# Altium PCB POD-Design-v1.0.PcbDoc (part 1 of 8)
Units mil, origin at the board's own origin, x right, y up, seen from the top; angles counter-clockwise.
Board outline 5511.81 x 3937.01 mil, 4 copper layers (Top Layer, Layer 1, Layer 2, Bottom Layer), stack 61.653 mil thick; 347 components, 252 nets, 1015 pads, 412 vias.
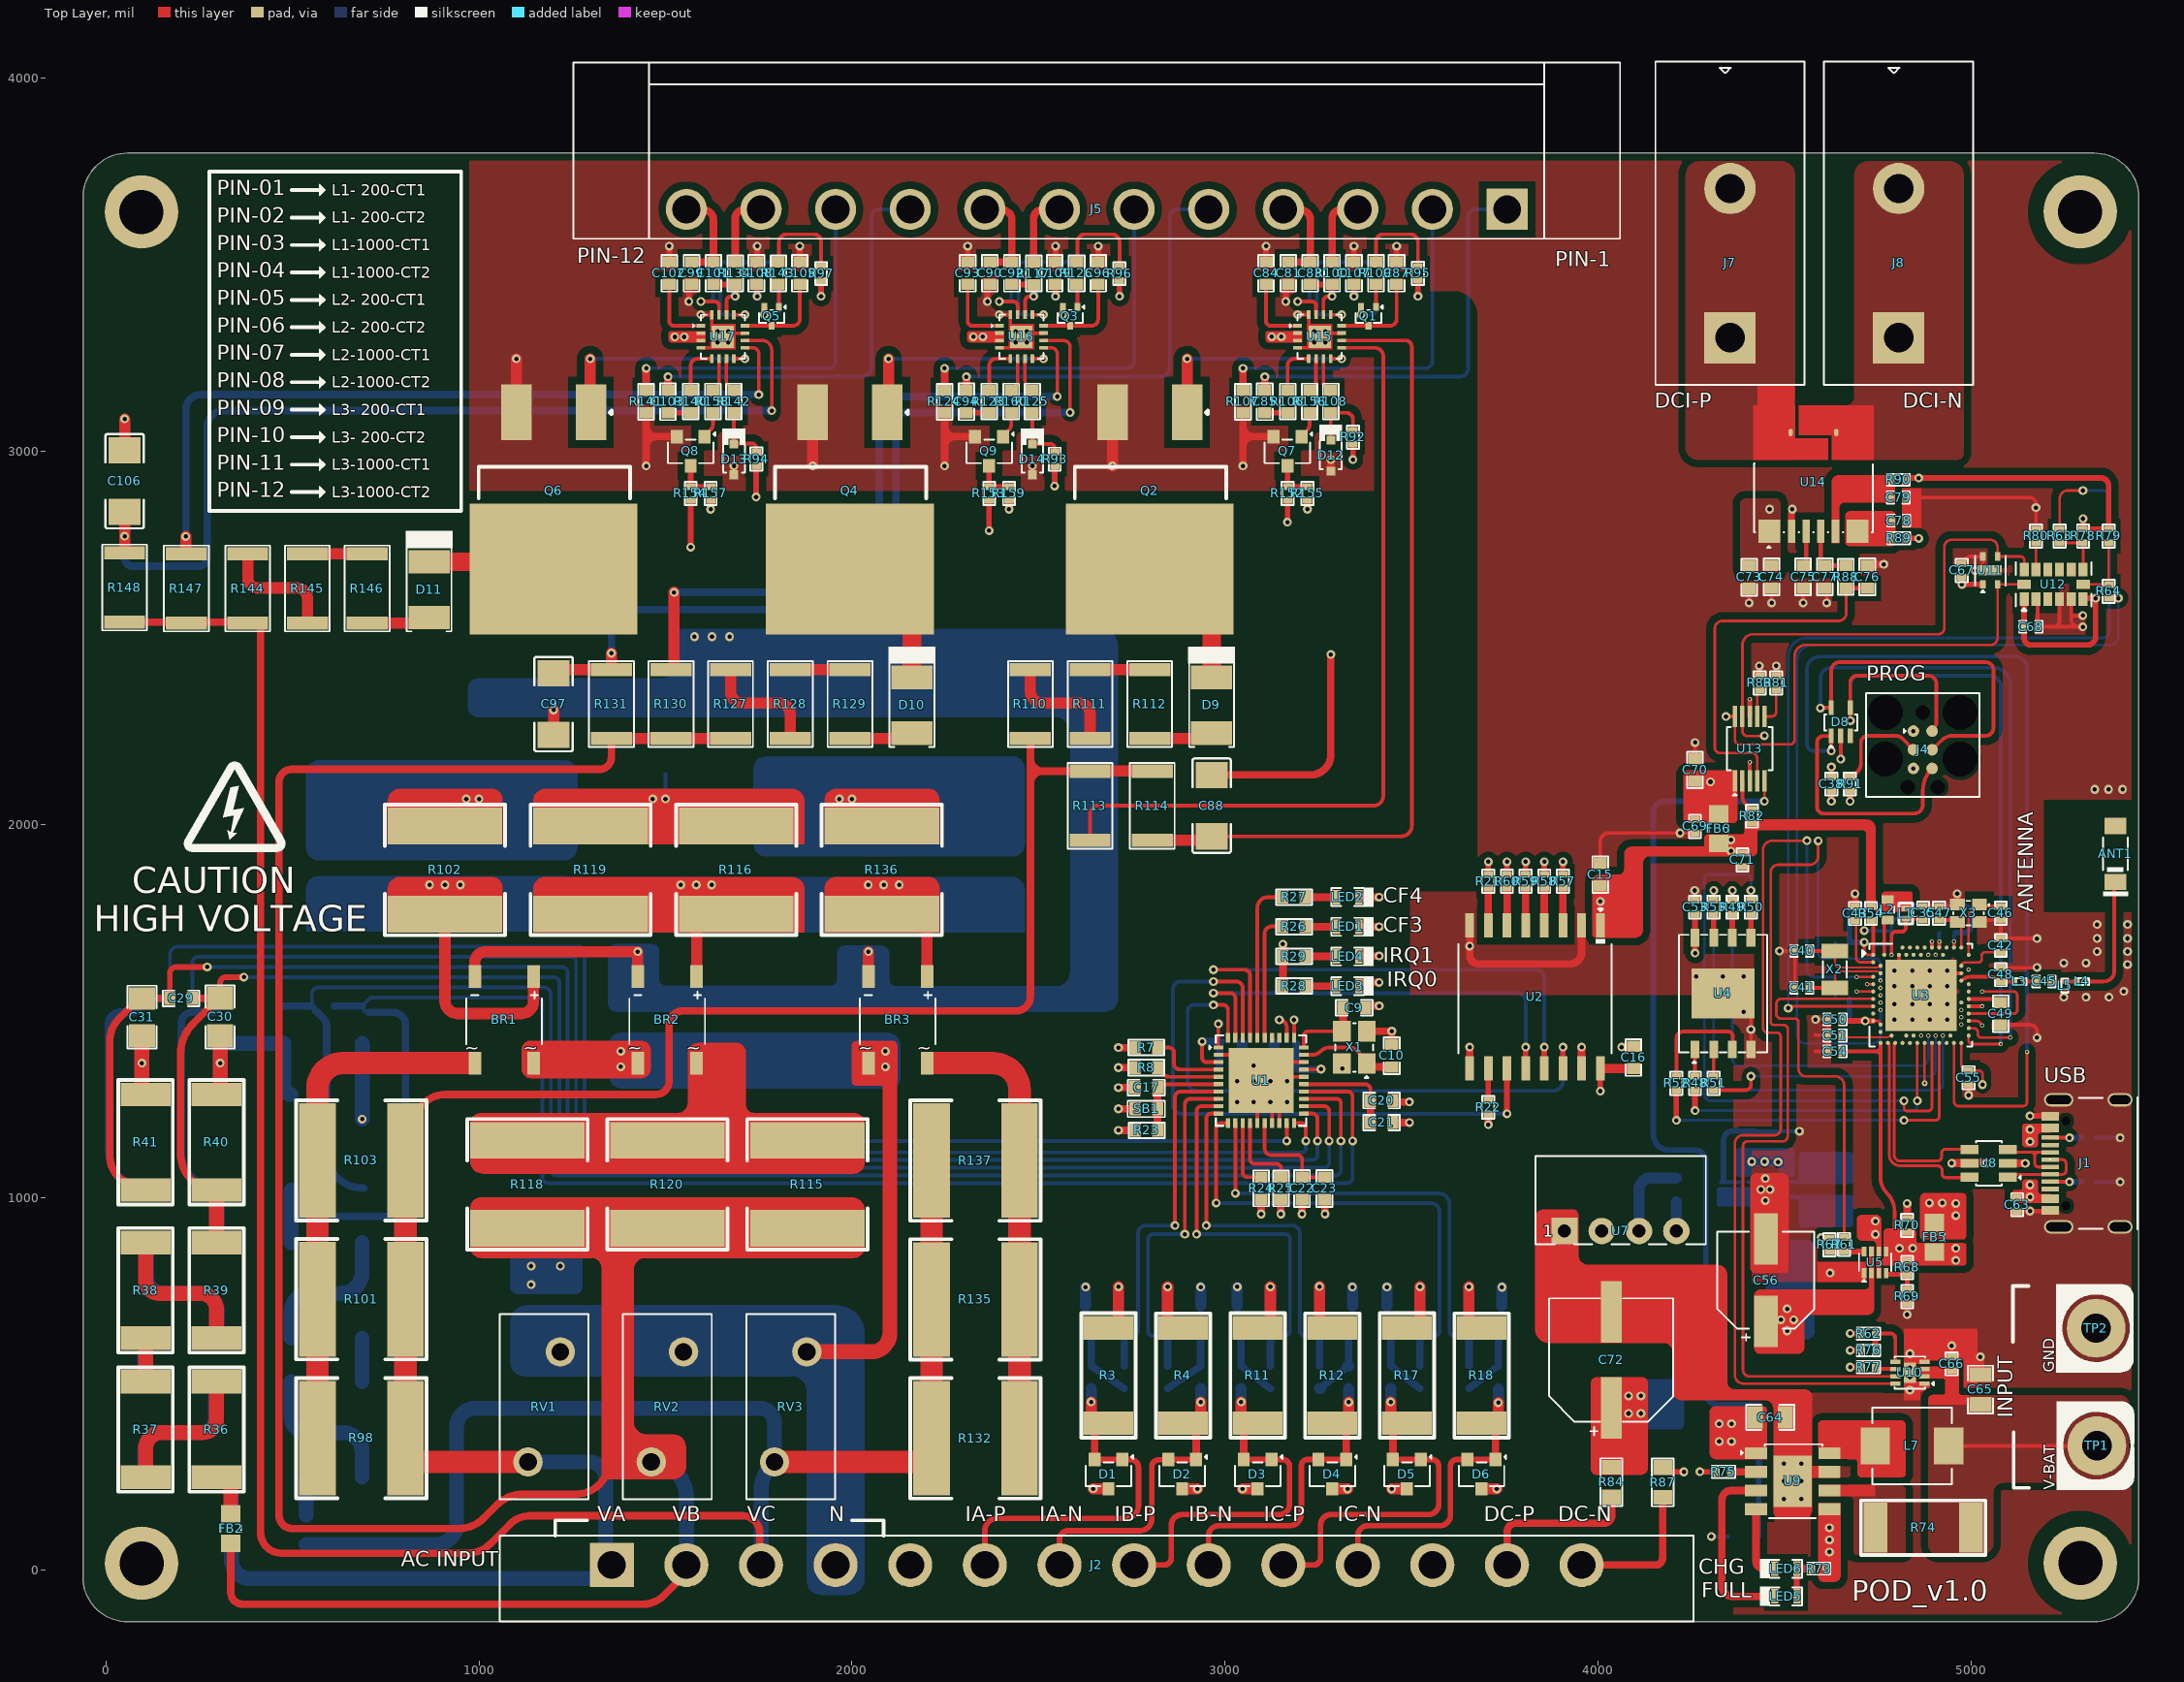
[diagram p0: Top Layer view]
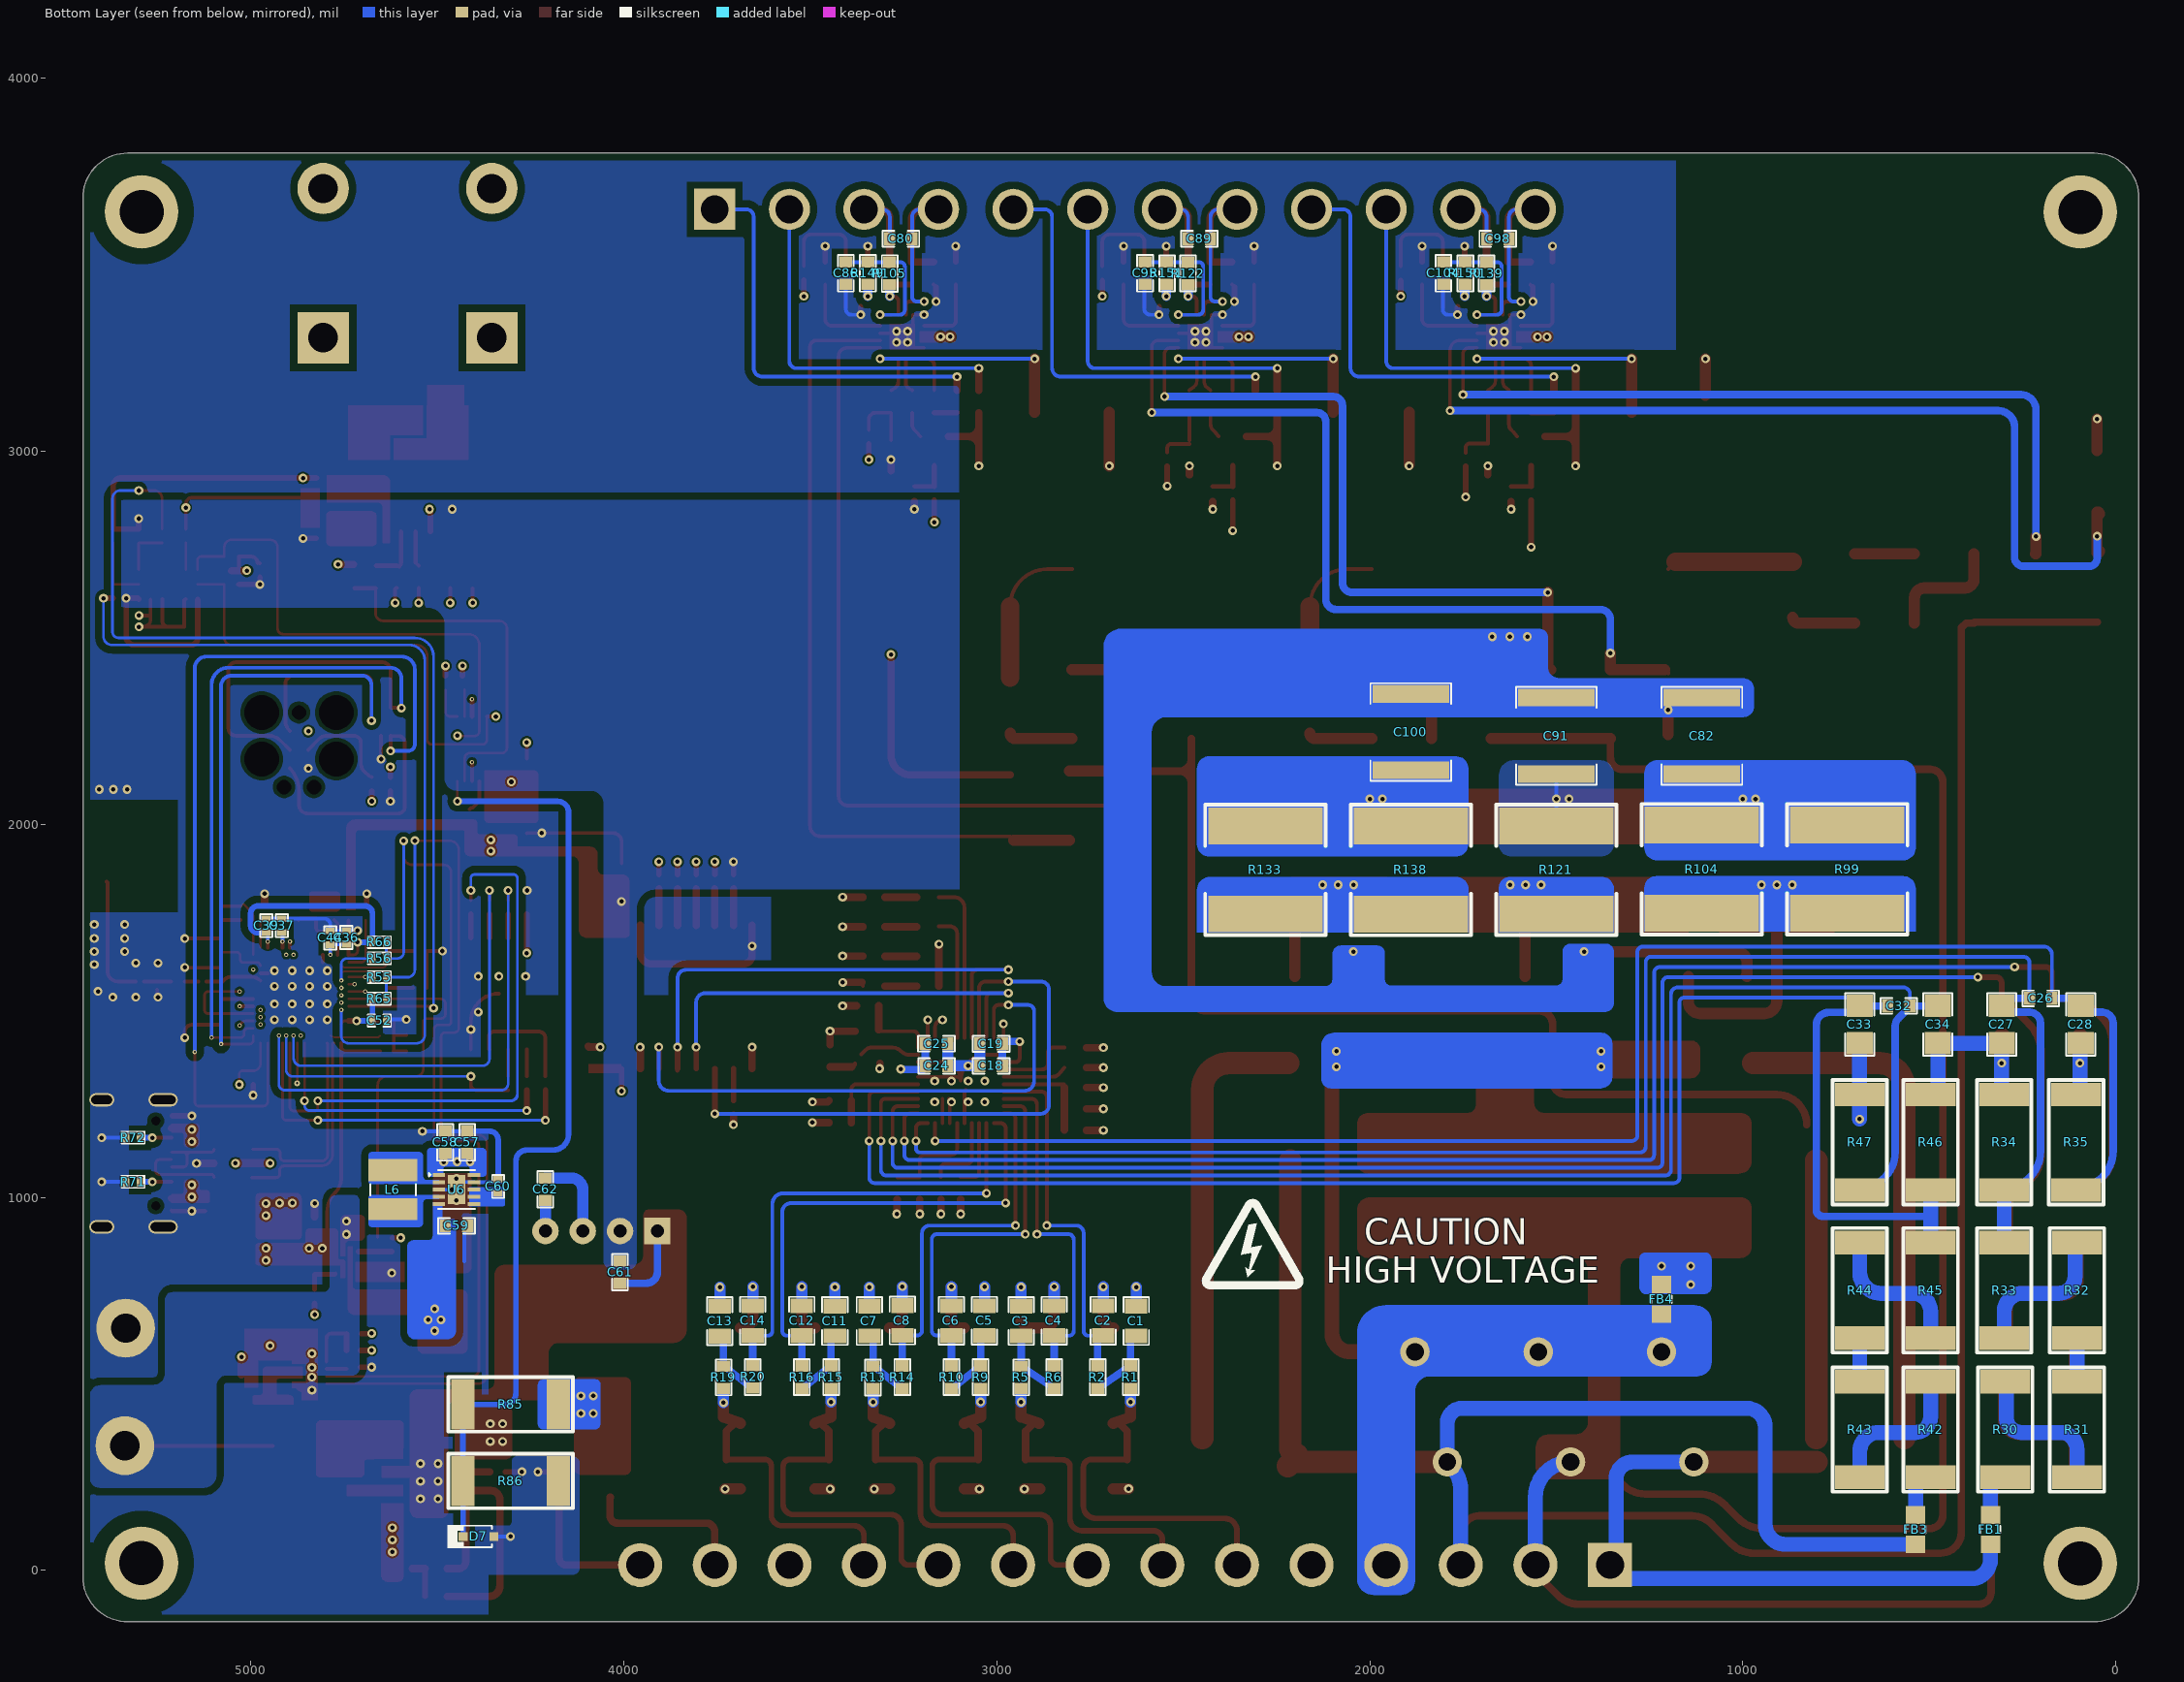
[diagram p1: Bottom Layer view, seen from below]
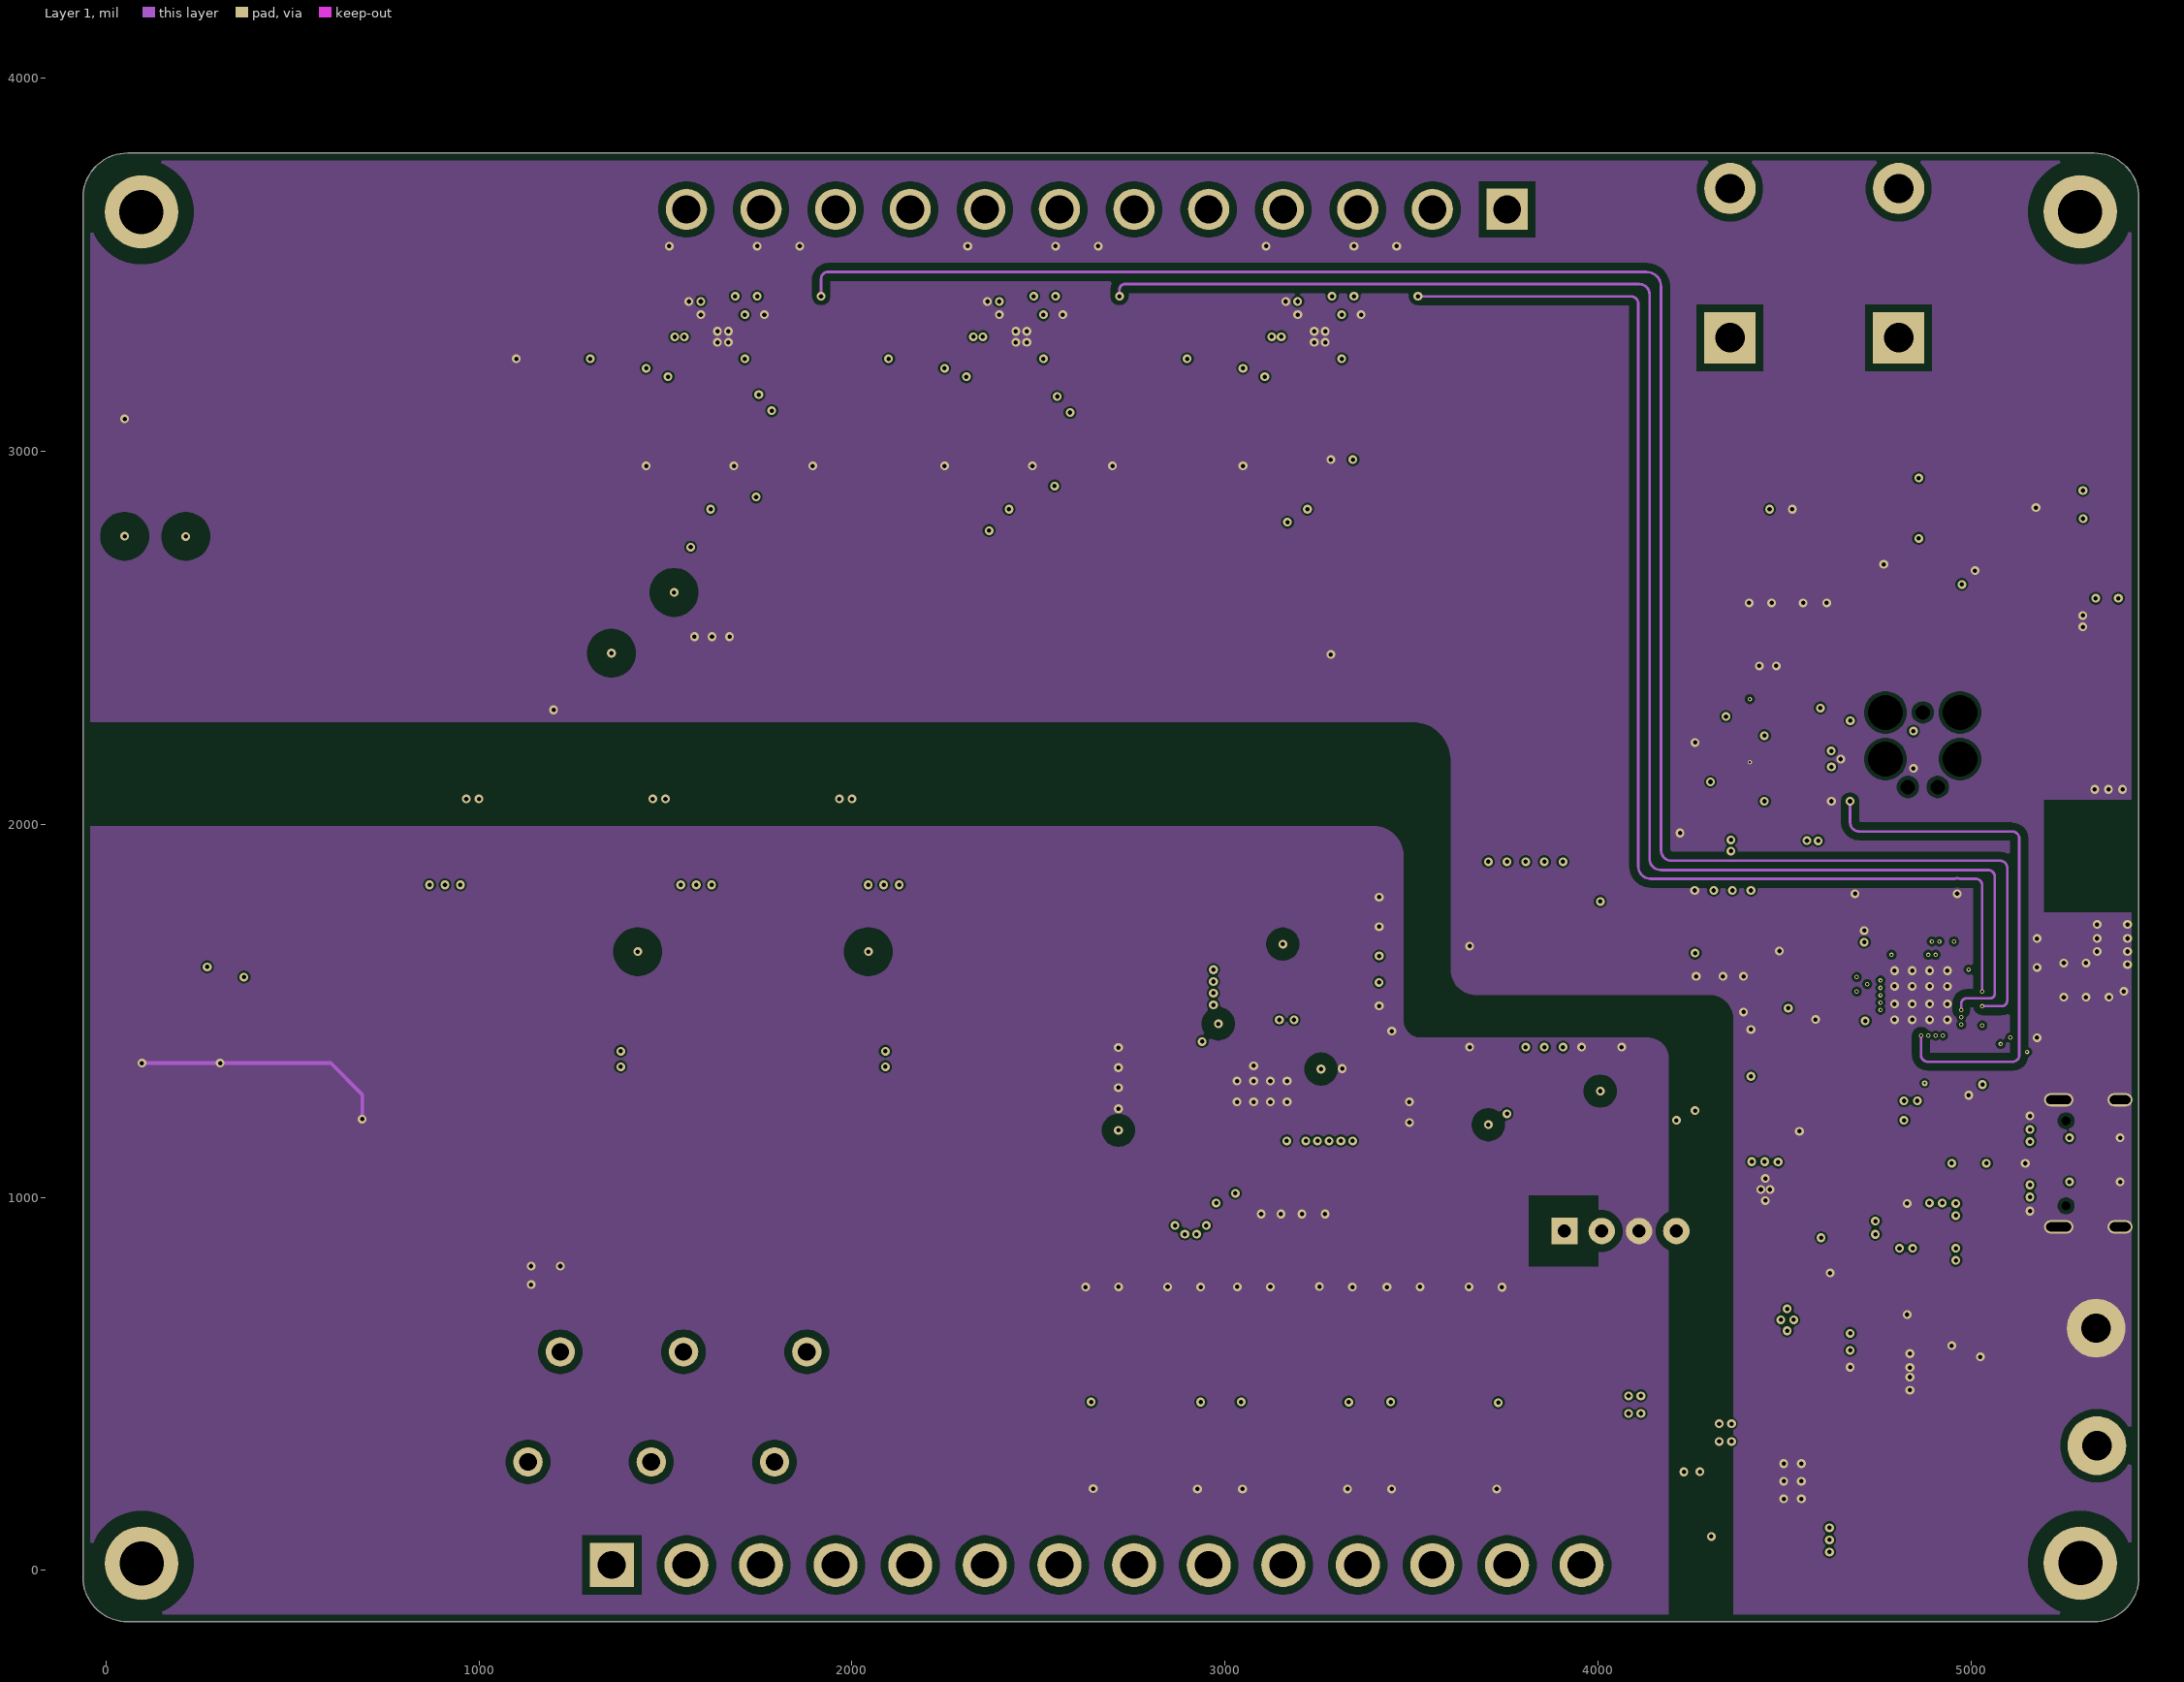
[diagram p2: Layer 1]
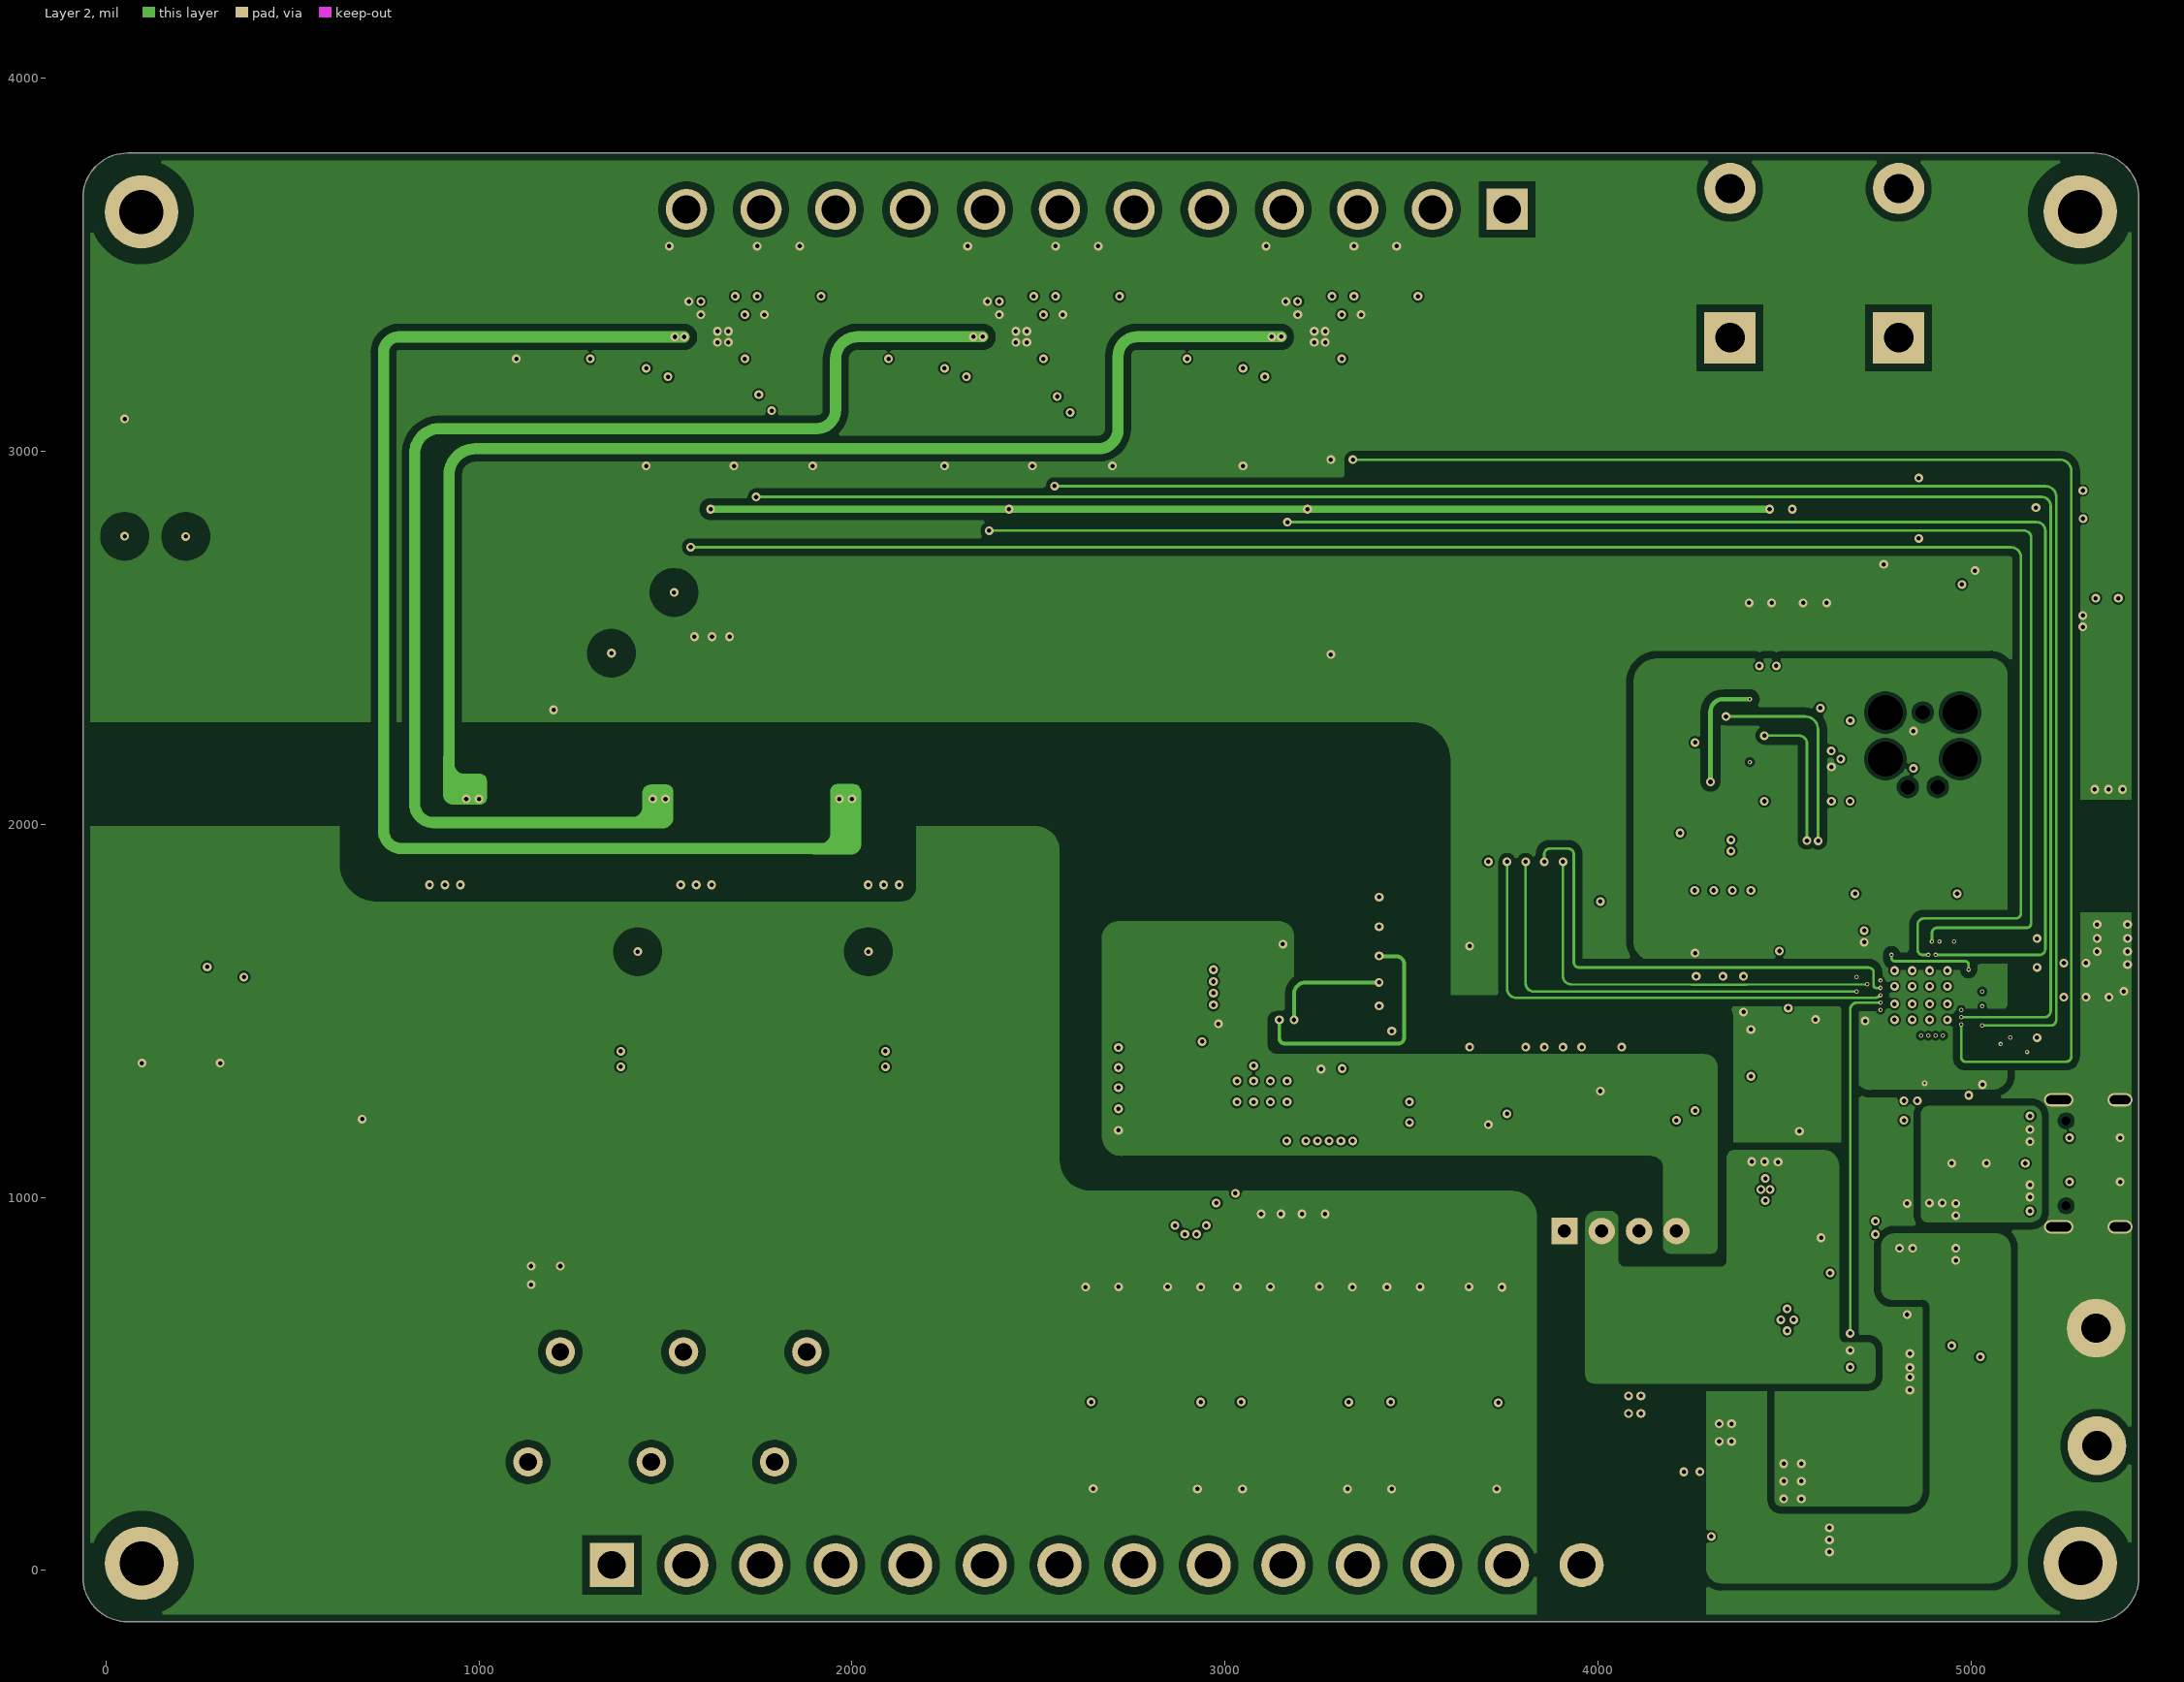
[diagram p3: Layer 2]
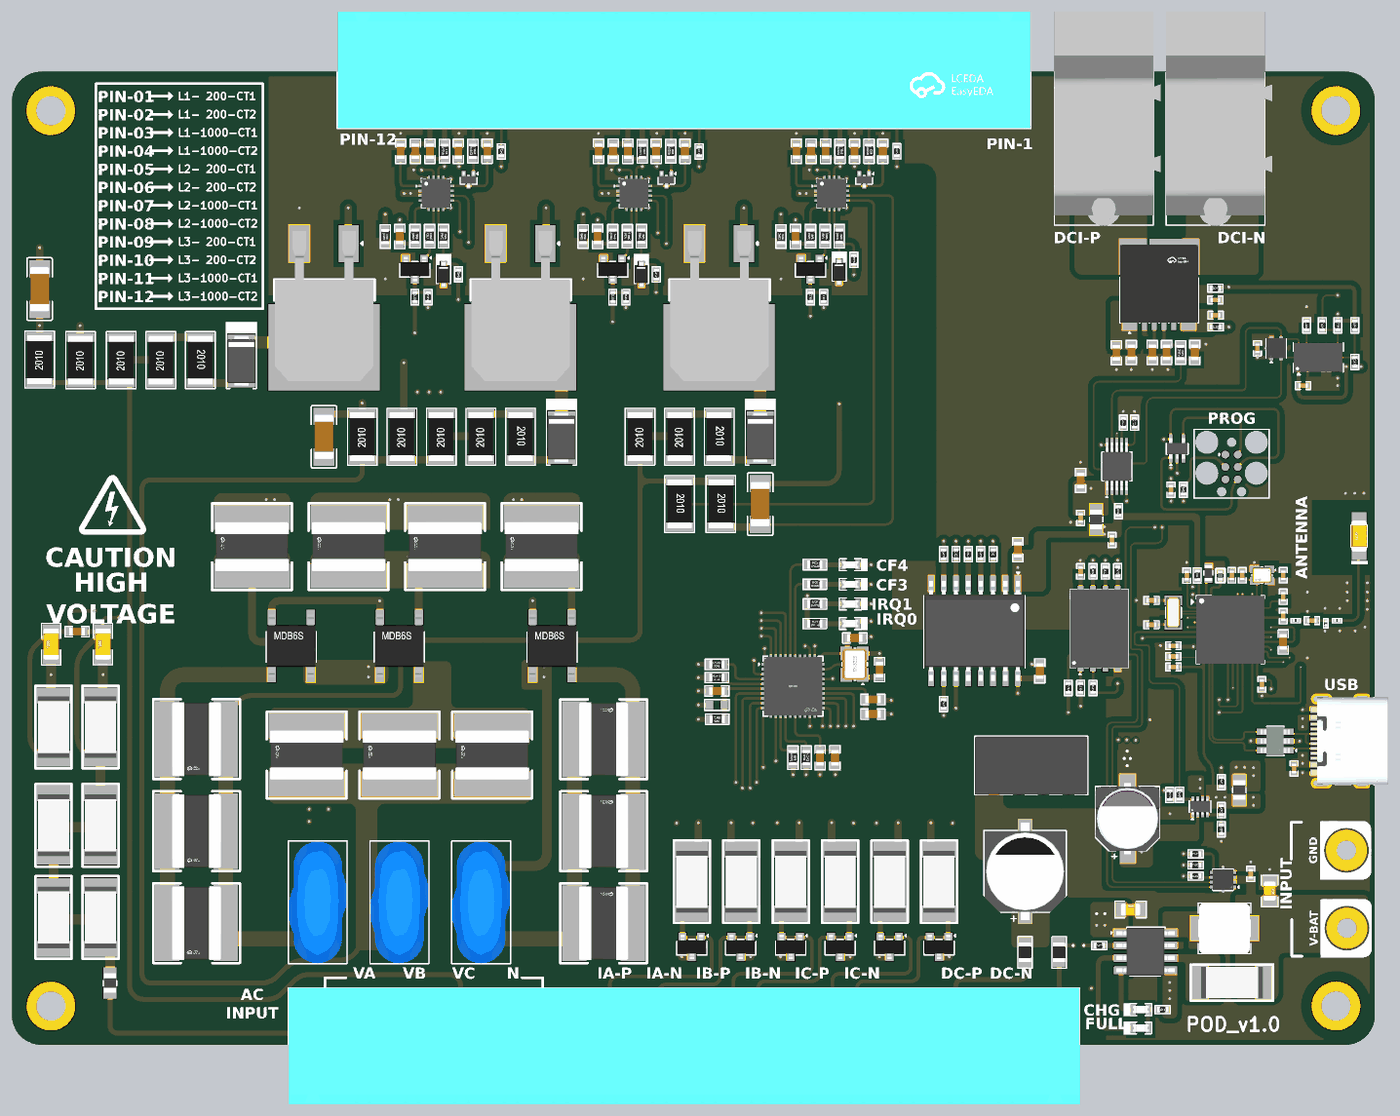
[diagram p7: 3D render of the assembled board from above, using the file's embedded part models]
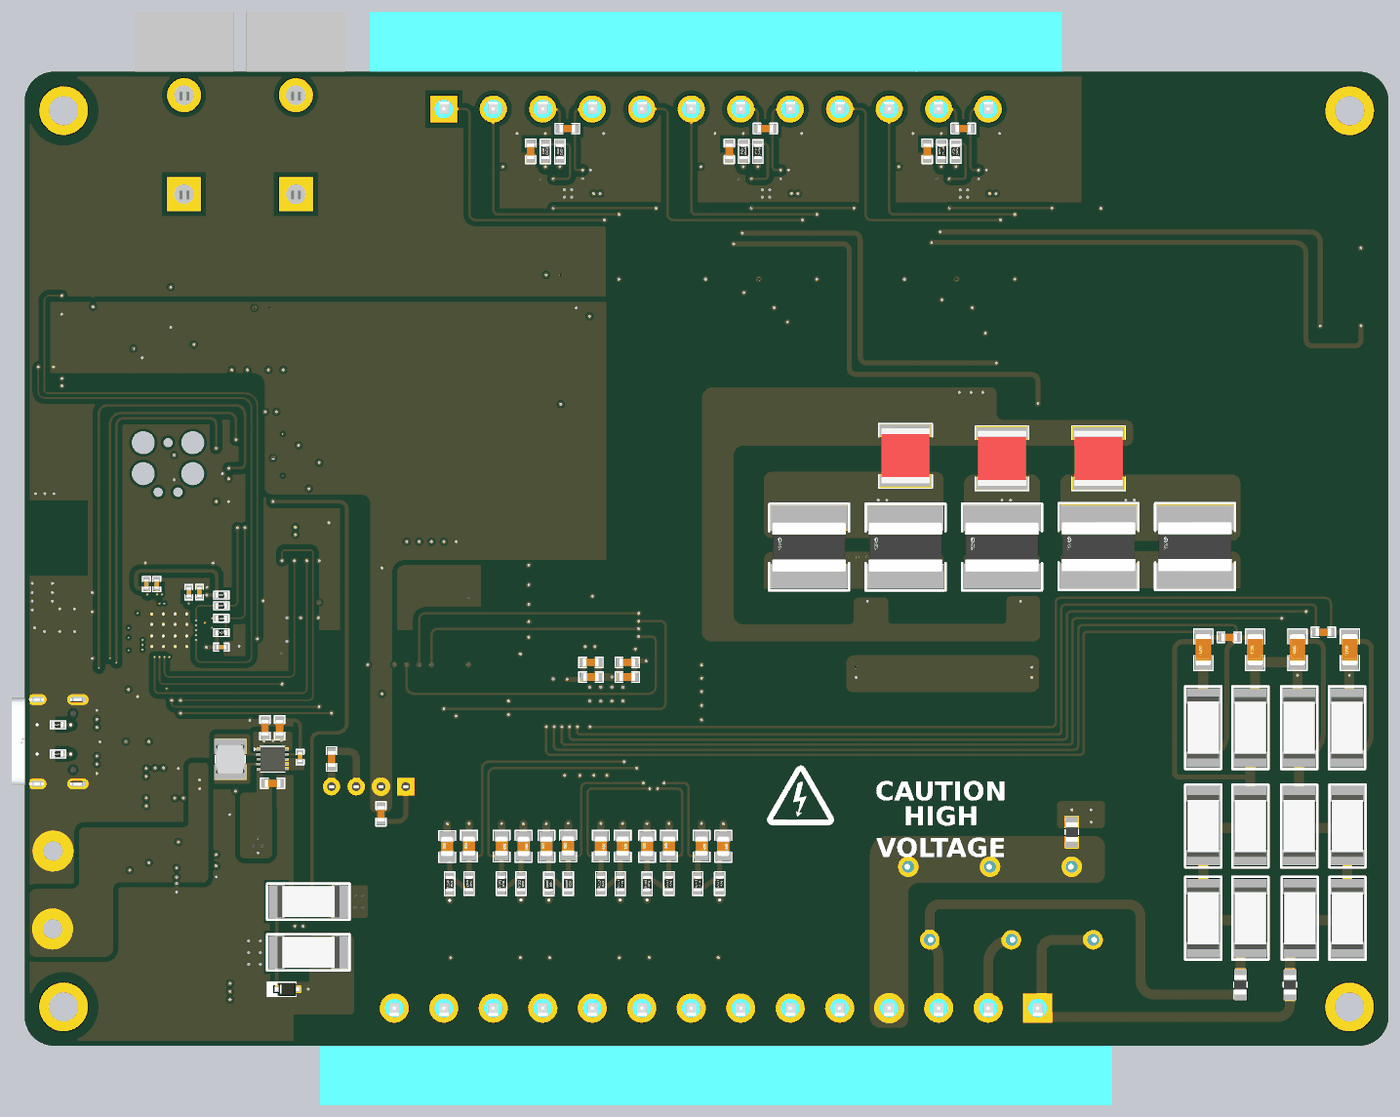
[diagram p8: 3D render of the assembled board from below, using the file's embedded part models]

## Layer stack, top to bottom
Top Solder: solder mask 0.4, Solder Resist, Dk 3.5
Top Layer: signal copper 1.378
Dielectric 2: prepreg 7.992, PP-006, Dk 4.4
Layer 1: signal copper 1.181
Dielectric 1: dielectric 40.551, FR-4, Dk 4.4
Layer 2: signal copper 1.181
Dielectric 3: prepreg 7.992, PP-006, Dk 4.4
Bottom Layer: signal copper 1.378
Bottom Solder: solder mask 0.4, Solder Resist, Dk 3.5

## Board outline
-61.81,-17.43 -61.81,3679.57 cw(c58.19,3679.57) 58.19,3799.57 5330,3799.57 cw(c5330,3679.57) 5450,3679.57 5450,-17.43 cw(c5330,-17.43) 5330,-137.43 58.19,-137.43 cw(c58.19,-17.43)

## Design rules (kind name [scope] priority, off if disabled: settings)
BoardOutlineClearance [All] p1: gap=0 ignorepadtopadclearanceinfootprint=FALSE except(20: Poly-OutlineEdge)
Clearance [All] p1: gap=10 ignorepadtopadclearanceinfootprint=TRUE except(5: Arc-Arc Arc-Track Arc-Via Track-Track Track-Via SMDPad-Via SMDPad-Hole THPad-Via Via-Via Via-Fill Via-Poly Via-Region Via-Text Via-Hole; 6: Arc-SMDPad Track-SMDPad; 7: Arc-Region Track-Region SMDPad-Region Region-Region; 20: Arc-Poly Track-Poly SMDPad-Poly THPad-Poly Fill-Poly Poly-Poly Poly-Region)
DiffPairsRouting DIFF_USB [InDifferentialPairClass('USB')] p1: maxlimit=7 minlimit=5 mostfreqgap=7 toplayer_maxgap=5 toplayer_prefgap=5 toplayer_minwidth=8 toplayer_maxwidth=8 toplayer_prefwidth=8 midlayer1_mingap=7 midlayer1_minwidth=7 midlayer1_maxwidth=7 midlayer1_prefwidth=7 midlayer2_mingap=7 midlayer2_minwidth=7 midlayer2_maxwidth=7 midlayer2_prefwidth=7 bottomlayer_maxgap=5 bottomlayer_prefgap=5 bottomlayer_minwidth=8 bottomlayer_maxwidth=8 bottomlayer_prefwidth=8 impedanceprofiledriven=TRUE impedanceprofileid={1E9BEBC2-1003-4C39-B1A7-DBA95B5BA262} impedanceprofilevalue=90.000000 maxuncoupledlength=500
Height [All] p1: minheight=0 maxheight=2000 prefheight=500
HoleSize [All] p1: absolutevalues=TRUE maxlimit=196.85 minlimit=1 maxpercent=80.000 minpercent=20.000
HoleToHoleClearance [All] p1: gap=7 allowstackedmicrovias=TRUE
MinimumSolderMaskSliver [All] p1: minsoldermaskwidth=0
PolygonConnect [All] p1: connectstyle=Direct reliefconductorwidth=15 reliefentries=4 polygonreliefangle="45 Angle" airgapwidth=10
RoutingVias [All] p1: holewidth=7.87 width=15.75 viastyle="Through Hole" minholewidth=5.91 minwidth=11.81 maxholewidth=11.81 maxwidth=23.62
SilkToSilkClearance [All] p1: silktosilkclearance=0
SilkToSolderMaskClearance [IsPad] p1: minsilkscreentomaskgap=0 clearancetoexposedcopper=TRUE
SolderMaskExpansion [All] p1: expansion=4 istentingtop=FALSE
SupplyNets "Schematic Supply Nets_35" [InNet('VA_P')] p1: voltage=0.000
SupplyNets "Schematic Supply Nets_34" [InNet('3V3-IS')] p2: voltage=0.000
SupplyNets "Schematic Supply Nets_33" [InNet('INN1')] p3: voltage=0.000
SupplyNets "Schematic Supply Nets_32" [InNet('VA_N')] p4: voltage=0.000
SupplyNets "Schematic Supply Nets_31" [InNet('DVDD1')] p5: voltage=0.000
SupplyNets "Schematic Supply Nets_30" [InNet('AVDD1')] p6: voltage=0.000
SupplyNets "Schematic Supply Nets_29" [InNet('VB_P')] p7: voltage=0.000
SupplyNets "Schematic Supply Nets_28" [InNet('REF1')] p8: voltage=0.000
SupplyNets "Schematic Supply Nets_27" [InNet('VBUS-TYPEC')] p9: voltage=0.000
SupplyNets "Schematic Supply Nets_26" [InNet('3V3')] p10: voltage=0.000
SupplyNets "Schematic Supply Nets_25" [InNet('VB_N')] p11: voltage=0.000
SupplyNets "Schematic Supply Nets_24" [InNet('VC_N')] p12: voltage=0.000
SupplyNets "Schematic Supply Nets_23" [InNet('ICN1')] p13: voltage=0.000
SupplyNets "Schematic Supply Nets_22" [InNet('V-OR')] p14: voltage=0.000
SupplyNets "Schematic Supply Nets_21" [InNet('IBP1')] p15: voltage=0.000
SupplyNets "Schematic Supply Nets_20" [InNet('IAP1')] p16: voltage=0.000
SupplyNets "Schematic Supply Nets_19" [InNet('INP1')] p17: voltage=0.000
SupplyNets "Schematic Supply Nets_18" [InNet('IAN1')] p18: voltage=0.000
SupplyNets "Schematic Supply Nets_17" [InNet('VBUS')] p19: voltage=0.000
SupplyNets "Schematic Supply Nets_16" [InNet('NGND')] p20: voltage=0.000
SupplyNets "Schematic Supply Nets_15" [InNet('IBN1')] p21: voltage=0.000
SupplyNets "Schematic Supply Nets_14" [InNet('VDD-nRF')] p22: voltage=0.000
SupplyNets "Schematic Supply Nets_13" [InNet('VC_P')] p23: voltage=0.000
SupplyNets "Schematic Supply Nets_12" [InNet('ICP1')] p24: voltage=0.000
SupplyNets "Schematic Supply Nets_10" [InNet('VBAT')] p25: voltage=0.000
SupplyNets "Schematic Supply Nets_7" [InNet('GND')] p26: voltage=0.000
UnRoutedNet [All] p1: checkbadconnections=TRUE
Width [All] p1: maxlimit=60 minlimit=5 preferedwidth=10 midlayer1_minwidth=7 midlayer2_minwidth=7 bottomlayer_minwidth=7 minimp=50.000000 maximp=50.000000 favimp=50.000000
22 further rules are at their usual default settings.

## Classes and differential pairs
component class Ground-Fault-Detect-Sheet-3: BR3 C98 C99 C100 C101 C102 C103 C104 C105 C106 C108 D11 D13 Q5 Q6 Q8 R132 R133 R134 R135 R136 R137 R138 R139 R140 R141 R142 R143 R144 R145 R146 R147 R148 R150 R157 R158 RV3 U17
component class Ground-Fault-Detect-Sheet-2: BR2 C89 C90 C91 C92 C93 C94 C95 C96 C97 C109 D10 D14 Q3 Q4 Q9 R115 R116 R117 R118 R119 R120 R121 R122 R123 R124 R125 R126 R127 R128 R129 R130 R131 R151 R159 R160 RV2 U16
component class Ground-Fault-Detect-Sheet-1: BR1 C80 C81 C82 C83 C84 C85 C86 C87 C88 C107 D9 D12 Q1 Q2 Q7 R98 R99 R100 R101 R102 R103 R104 R105 R106 R107 R108 R109 R110 R111 R112 R113 R114 R149 R155 R156 RV1 U15
differential pair class USB: TYPEC TYPEC_D
component class Power-Sheet: C56 C57 C58 C59 C60 C61 C62 L6 R67 R68 R69 R70 U5 U6 U7
component class Motion-Temp-Sensor-Sheet: C67 C68 R78 R79 R80 U11 U12
component class DC-Measurement-Sheet: C69 C70 C71 C72 C73 C74 C75 C76 C77 C78 C79 D7 FB6 R81 R82 R83 R84 R85 R86 R87 R88 R89 R90 U13 U14
component class Connector-Sheet: J2 J3 J5 J7 J8
component class BLE-MCU-Sheet: ANT1 C35 C36 C37 C38 C39 C40 C41 C42 C43 C44 C45 C46 C47 C48 C49 C50 C51 C52 C53 C54 C55 D8 J4 L1 L2 L3 L4 L5 R48 R49 R50 R51 R52 R53 R54 R55 R56 R57 R58 R59 R60 R61 R62 R63 R64 R65 R66 R91 R92 R93 R94 R95 R96 R97 R152 R153 R154 U3 U4 X2 X3
component class Battery-Charging-Sheet: C63 C64 C65 C66 FB5 J1 L7 LED5 LED6 R71 R72 R73 R74 R75 R76 R77 TP1 TP2 U8 U9 U10
component class AC-Measurement-Sheet-2: C26 C27 C28 C29 C30 C31 C32 C33 C34 FB1 FB2 FB3 FB4 R30 R31 R32 R33 R34 R35 R36 R37 R38 R39 R40 R41 R42 R43 R44 R45 R46 R47
component class AC-Measurement-Sheet-1: C1 C2 C3 C4 C5 C6 C7 C8 C9 C10 C11 C12 C13 C14 C15 C16 C17 C18 C19 C20 C21 C22 C23 C24 C25 D1 D2 D3 D4 D5 D6 LED1 LED2 LED3 LED4 R1 R2 R3 R4 R5 R6 R7 R8 R9 R10 R11 R12 R13 R14 R15 R16 R17 R18 R19 R20 R21 R22 R23 R24 R25 R26 R27 R28 R29 SB1 U1 U2 X1
differential pair TYPEC: +TYPEC_P -TYPEC_N
differential pair TYPEC_D: +TYPEC_D_P -TYPEC_D_N

## Components (designator, comment, footprint, x,y, rotation, side; value= is the part's Value field where it differs from the comment)
ANT1 "2450AT18B100E" ANT-1206 5387,1920.82 r90 top
BR1 "MDB6S" TSSOP-4(5.0x4.4) 1067.61,1476.14 r180 top
BR2 "MDB6S" TSSOP-4(5.0x4.4) 1504.53,1476.14 r180 top
BR3 "MDB6S" TSSOP-4(5.0x4.4) 2122.68,1476.14 r180 top
C1 "22nF" Cap-0805 2626.16,668.79 r270 bottom
C2 "22nF" Cap-0805 2714.58,669.42 r270 bottom
C3 "22nF" Cap-0805 2934.58,668.79 r90 bottom
C4 "22nF" Cap-0805 2846.17,669.42 r90 bottom
C5 "22nF" Cap-0805 3033.16,669.41 r270 bottom
C6 "22nF" Cap-0805 3121.58,669.42 r270 bottom
C7 "22nF" Cap-0805 3341.58,668.79 r90 bottom
C8 "22nF" Cap-0805 3253.17,670.05 r90 bottom
C9 "15pF" Cap-0603 3346.5,1508.5 r180 top
C10 "15pF" Cap-0603 3447.1,1379.91 r270 top
C11 "22nF" Cap-0805 3434.17,668.79 r270 bottom
C12 "22nF" Cap-0805 3522.58,669.42 r270 bottom
C13 "22nF" Cap-0805 3742.58,668.28 r90 bottom
C14 "22nF" Cap-0805 3654.17,669.42 r90 bottom
C15 "0.1uF" Cap-0603 4005.93,1865.44 r270 top value=100nF
C16 "0.1uF" Cap-0603 4095,1375 r270 top value=100nF
C17 "0.1uF" Cap-0603 2789.01,1294.62 r0 top value=100nF
C18 "0.1uF" Cap-0603 3015.12,1352.72 r180 bottom value=100nF
C19 "4.7uF" Cap-0603 3015.12,1411.77 r180 bottom
C20 "0.1uF" Cap-0603 3420,1260 r180 top value=100nF
C21 "4.7uF" Cap-0603 3419.99,1200.65 r180 top
C22 "0.1uF" Cap-0603 3206.56,1024.03 r90 top value=100nF
C23 "4.7uF" Cap-0603 3266.56,1024.03 r90 top
C24 "0.1uF" Cap-0603 3161.36,1352.71 r0 bottom value=100nF
C25 "4.7uF" Cap-0603 3161.71,1411.9 r0 bottom
C26 "51pF" Cap-0603 201.39,1533.72 r180 bottom
C27 "22nF" Cap-1206 306.36,1463.38 r90 bottom
C28 "22nF" Cap-1206 94.55,1463.38 r90 bottom
C29 "51pF" Cap-0603 201.39,1533.72 r180 top
C30 "22nF" Cap-1206 306.39,1483.88 r90 top
C31 "22nF" Cap-1206 96.39,1483.71 r90 top
C32 "51pF" Cap-0603 582.07,1513.38 r180 bottom
C33 "22nF" Cap-1206 687.07,1463.38 r90 bottom
C34 "22nF" Cap-1206 477.07,1463.38 r90 bottom
C35 "1uF" Cap-0402 4871.63,1762.13 r270 top
C36 "47nF" Cap-0402 4743.6,1696.7 r270 bottom
C37 "DNP" Cap-0402 4916.57,1728.55 r90 bottom value=100nF
C38 "1uF" Cap-0402 4625.62,2108.12 r90 top
C39 "0.1uF" Cap-0402 4957.97,1728.55 r270 bottom value=100nF
C40 "6.8pF" Cap-0402 4546.5,1660.57 r0 top locked
C41 "6.8pF" Cap-0402 4546.5,1562.14 r0 top locked
C42 "100pF" Cap-0402 5079.62,1675.51 r90 top
C43 "0.1uF" Cap-0402 4689,1761 r270 top value=100nF
C44 "DNP" Cap-0402 4786.87,1696 r90 bottom value=100nF
C45 "2.2pF" Cap-0402 5195.49,1578.87 r0 top
C46 "9pF" Cap-0402 5079.63,1762.13 r90 top
C47 "9pF" Cap-0402 4914,1762.13 r270 top
C48 "0.8pF" Cap-0402 5079.61,1597.37 r270 top
C49 "820pF" Cap-0603 5079.61,1492.76 r90 top
C50 "4.7uF" Cap-0402 4635,1477.07 r0 top
C51 "4.7uF" Cap-0402 4635,1433.87 r0 top
C52 "0.1uF" Cap-0402 4655.22,1473.88 r0 bottom value=100nF
C53 "0.1uF" Cap-0402 4260,1778.14 r270 top value=100nF
C54 "4.7uF" Cap-0402 4635.27,1391.38 r0 top
C55 "0.1uF" Cap-0402 4993,1321 r90 top value=100nF
C56 "120uF" 20SVPF120M 4449.92,778.05 r90 top
C57 "10uF" Cap-0603 4419.68,1147.59 r270 bottom
C58 "10uF" Cap-0603 4478.68,1147.59 r270 bottom
C59 "10uF" Cap-0603 4448.3,923.83 r0 bottom
C60 "0.1uF" Cap-0402 4336.68,1029.59 r270 bottom value=100nF
C61 "10uF" Cap-0603 4010,800 r90 bottom
C62 "10uF" Cap-0603 4210,1021.77 r270 bottom
C63 "0.1uF" Cap-0402 5123.59,980.52 r270 top value=100nF
C64 "22uF" Cap-0805 4462.01,410.41 r0 top
C65 "22uF" Cap-0805 5025,485 r270 top
C66 "1uF" Cap-0402 4948.05,554 r270 top
C67 "0.1uF" Cap-0402 4975.32,2680.75 r270 top value=100nF
C68 "0.1uF" Cap-0402 5160.24,2529.64 r0 top value=100nF
C69 "0.1uF" Cap-0402 4260,1994.69 r90 top value=100nF
C70 "10uF" Cap-0603 4260.01,2146.14 r270 top
C71 "0.1uF" Cap-0402 4387.02,1905 r90 top value=100nF
C72 "10uF" UD2C100M0810 4035.43,564.14 r90 top
C73 "10uF" Cap-0603 4405.01,2662.52 r90 top
C74 "0.1uF" Cap-0603 4465.01,2663.62 r90 top
C75 "6.8nF" Cap-0603 4549.67,2663.59 r90 top
C76 "15nF" Cap-0603 4721.68,2663.57 r270 top
C77 "6.8nF" Cap-0603 4607.98,2663.58 r90 top
C78 "1nF" Cap-0402 4805.92,2814.18 r180 top
C79 "1nF" Cap-0402 4804.92,2876.16 r180 top
C80 "470nF" Cap-0603 3257.01,3570.05 r0 bottom
C81 "180pF" Cap-0603 3169.68,3477.39 r90 top
C82 "3.3uF" "Cap 2220" 1110,2237.36 r270 bottom
C83 "1000pF" Cap-0603 3228.63,3477.39 r270 top
C84 "1000pF" Cap-0603 3110.16,3477.4 r270 top
C85 "0.1uF" Cap-0603 3106.7,3132.95 r90 top
C86 "1000pF" Cap-0603 3404.44,3477.4 r90 bottom
C87 "1000pF" Cap-0603 3460,3477.4 r270 top
C88 "1nF/2Kv" "Cap 1808" 2964.21,2050.2 r270 top value=1nF
C89 "470nF" Cap-0603 2457.01,3570.05 r0 bottom
C90 "180pF" Cap-0603 2369.68,3477.39 r90 top
C91 "3.3uF" "Cap 2220" 1500,2237.36 r270 bottom
C92 "1000pF" Cap-0603 2428.63,3477.39 r270 top
C93 "1000pF" Cap-0603 2310.16,3477.4 r270 top
C94 "0.1uF" Cap-0603 2306.7,3132.95 r90 top
C95 "1000pF" Cap-0603 2602.44,3477.4 r90 bottom
C96 "1000pF" Cap-0603 2660,3477.4 r270 top
C97 "1nF/2Kv" "Cap 1808" 1200,2322.47 r90 top value=1nF
C98 "470nF" Cap-0603 1657.01,3570.05 r0 bottom
C99 "180pF" Cap-0603 1569.68,3477.39 r90 top
C100 "3.3uF" "Cap 2220" 1890,2247.36 r270 bottom
C101 "1000pF" Cap-0603 1628.63,3477.39 r270 top
C102 "1000pF" Cap-0603 1510.16,3477.4 r270 top
C103 "0.1uF" Cap-0603 1506.7,3132.95 r90 top
C104 "1000pF" Cap-0603 1802.44,3477.4 r90 bottom
C105 "1000pF" Cap-0603 1860,3477.41 r270 top
C106 "1nF/2Kv" "Cap 1808" 50,2920 r270 top value=1nF
C107 "10nF" Cap-0603 3345.71,3477.38 r90 top
C108 "10nF" Cap-0603 1743.71,3477.38 r90 top
C109 "10nF" Cap-0603 2543.71,3477.38 r90 top
D1 "BAV99,215" SOT-23 2687.58,258.28 r180 top value=1.5pF
D2 "BAV99,215" SOT-23 2885.17,258.28 r180 top value=1.5pF
D3 "BAV99,215" SOT-23 3087.58,258.28 r180 top value=1.5pF
D4 "BAV99,215" SOT-23 3287.57,258.27 r180 top value=1.5pF
D5 "BAV99,215" SOT-23 3487.58,258.28 r180 top value=1.5pF
D6 "BAV99,215" SOT-23 3687.57,258.28 r180 top value=1.5pF
D7 "MM3Z3V3B" SOD323F 4389.29,91.22 r0 bottom
D8 "ESDALC6V1W5" SOT-323-5 4650.61,2275.13 r90 top
D9 "BYG20J-E3/TR" SMA(DO-214AC) 2964.21,2319.34 r270 top
D10 "BYG20J-E3/TR" SMA(DO-214AC) 2160.48,2319.34 r270 top
D11 "BYG20J-E3/TR" SMA(DO-214AC) 866.01,2629.34 r270 top
D12 "MM3Z3V3B" SOD323F 3283.54,2988.62 r90 top
D13 "MM3Z3V3B" SOD323F 1683.54,2978.62 r90 top
D14 "MM3Z3V3B" SOD323F 2483.54,2978.62 r90 top
FB1 "BLM21BD152SN1D" Ind-0805 336.39,109.45 r90 bottom
FB2 "BLM21BD152SN1D" Ind-0805 334.58,112.31 r90 top
FB3 "BLM21BD152SN1D" Ind-0805 536.52,109.45 r90 bottom
FB4 "BLM21BD152SN1D" Ind-0805 1218.08,726.97 r90 bottom
FB5 "BLM21PG221SN1D" Ind-0805 4902,893 r270 top
FB6 "MMZ2012R102ATD25" Ind-0805 4323.02,1988.19 r270 top
J1 "TYPE-C-31-M-12" TYPE-C-31-M-12_ 5306,1091.5 r90 top
J2 "DB2ERM-5.08-14P-GN" DB2ERM-5.08-14P-GN 2656.1,14.82 r0 top
J4 "TC2030-IDC" TC2030-IDC_ 4870.61,2200.13 r270 top locked
J5 "DB2ERM-5.08-12P-GN" DB2ERM-5.08-12P-GN 2656.1,3648.79 r180 top
J7 "DB136H-10.16-1P-RD-P" DB136H-10.16-1P-RD-P 4353.91,3504.69 r0 top
J8 "DB136H-10.16-1P-BK-P" DB136H-10.16-1P-BK-P 4805.91,3504.69 r0 top
L1 "15nH" IND-0402 4825.09,1761 r270 top
L2 "10uH" "IND-0603 (1608 Metric)" 4776.4,1771.19 r90 top value=1.05R
L3 "3.9nH" IND-0201 5129.8,1578.87 r0 top
L4 "3.9nH" IND-0201 5297.32,1578.88 r0 top
L5 "DNP" IND-0201 5251.49,1568.04 r90 top
L6 "1.5uH" LVT303012-1R5M-N 4618.83,1021.22 r270 bottom
L7 "2.2uH" YSPI0520-2R2M_ 4841.8,333.98 r0 top
LED1 "Emerald" LED-0603 3329,1725.58 r0 top
LED2 "Emerald" LED-0603 3329,1805 r0 top
LED3 "Emerald" LED-0603 3329,1566.75 r0 top
LED4 "Emerald" LED-0603 3329,1646.17 r0 top
LED5 "Emerald" LED-0603 4503.26,-69.32 r180 top
LED6 "RED" LED-0603 4503.26,5 r180 top
Q1 "MMBT3904T-7-F" SOT-523 3384.75,3362.01 r180 top
Q2 "STB13007DT4" D2PAK 2798.2,2894.42 r180 top
Q3 "MMBT3904T-7-F" SOT-523 2584.75,3362.01 r180 top
Q4 "STB13007DT4" D2PAK 1994.47,2894.42 r180 top
Q5 "MMBT3904T-7-F" SOT-523 1784.75,3362.01 r180 top
Q6 "STB13007DT4" D2PAK 1200,2894.42 r180 top
Q7 "LMUN2211LT1G" SOT-23 3167.54,3000.27 r180 top
Q8 "LMUN2211LT1G" SOT-23 1567.54,3000.27 r180 top
Q9 "LMUN2211LT1G" SOT-23 2367.54,3000.27 r180 top
R1 "0R" Res-0603 2641.17,518.28 r90 bottom
R2 "1K" Res-0603 2729.58,518.28 r90 bottom
R3 "2mR" RES-2512 2687.58,522.63 r270 top
R4 "2mR" RES-2512 2887.58,522.63 r90 top
R5 "0R" Res-0603 2934.58,517.76 r90 bottom
R6 "1K" Res-0603 2846.17,518.28 r90 bottom
R7 "0R" Res-0603 2789.01,1401.7 r0 top
R8 "0R" Res-0603 2789.01,1348.16 r0 top
R9 "0R" Res-0603 3043.16,518.27 r90 bottom
R10 "1K" Res-0603 3121.58,518.28 r90 bottom
R11 "2mR" RES-2512 3087.58,522.63 r270 top
R12 "2mR" RES-2512 3287.58,522.63 r90 top
R13 "0R" Res-0603 3331.57,517.25 r90 bottom
R14 "1K" Res-0603 3253.17,518.28 r90 bottom
R15 "0R" Res-0603 3444.17,518.28 r90 bottom
R16 "1K" Res-0603 3522.58,518.28 r90 bottom
R17 "2mR" RES-2512 3487.58,522.63 r270 top
R18 "2mR" RES-2512 3687.58,522.63 r90 top
R19 "0R" Res-0603 3732.58,517.76 r90 bottom
R20 "1K" Res-0603 3654.16,518.79 r90 bottom
R21 "4.7K" Res-0402 3705.93,1847.44 r270 top
R22 "4.7K" Res-0402 3705.93,1241.44 r270 top
R23 "10K" Res-0603 2790,1180 r0 top
R24 "0R" Res-0603 3096.91,1024.5 r90 top
R25 "0R" Res-0603 3149.9,1024.5 r270 top
R26 "680R" Res-0603 3185.19,1725.58 r180 top
R27 "680R" Res-0603 3185.19,1804.99 r180 top
R28 "680R" Res-0603 3185.19,1566.75 r180 top
R29 "680R" Res-0603 3185.19,1646.16 r180 top
R30 "200K" RES-2512 296.39,378.03 r90 bottom
R31 "200K" RES-2512 103.99,378.03 r90 bottom
R32 "200K" RES-2512 103.99,751 r90 bottom
R33 "200K" RES-2512 299.37,751 r90 bottom
R34 "1K" RES-2512 299.37,1148 r270 bottom value=1kR
R35 "1K" RES-2512 106.39,1147.99 r270 bottom value=1kR
R36 "200K" RES-2512 296.39,378.03 r90 top
R37 "200K" RES-2512 106.39,378.03 r90 top
R38 "200K" RES-2512 106.39,751 r90 top
R39 "200K" RES-2512 296.39,751 r90 top
R40 "1K" RES-2512 296.39,1148 r270 top value=1kR
R41 "1K" RES-2512 106.39,1148 r270 top value=1kR
R42 "200K" RES-2512 496.52,378.03 r90 bottom
R43 "200K" RES-2512 686.52,378.03 r90 bottom
R44 "200K" RES-2512 686.52,751 r90 bottom
R45 "200K" RES-2512 496.52,751 r90 bottom
R46 "1K" RES-2512 496.52,1148 r270 bottom value=1kR
R47 "1K" RES-2512 686.52,1148.2 r270 bottom value=1kR
R48 "0R" Res-0402 4260,1306.14 r90 top
R49 "0R" Res-0402 4359.99,1778.14 r270 top
R50 "0R" Res-0402 4409.99,1778.14 r270 top
R51 "0R" Res-0402 4309.99,1306.14 r90 top
R52 "0R" Res-0402 4210.01,1306.14 r90 top
R53 "0R" Res-0402 4309.99,1778.14 r270 top
R54 "0R" Res-0402 4731.66,1761.32 r270 top
R55 "0R" Res-0402 4655.22,1590.37 r180 bottom
R56 "0R" Res-0402 4655.22,1640.74 r180 bottom
R57 "0R" Res-0402 3905.93,1847.44 r270 top
R58 "0R" Res-0402 3855.93,1847.42 r270 top
R59 "0R" Res-0402 3805.93,1847.43 r270 top
R60 "0R" Res-0402 3755.93,1847.44 r270 top
R61 "0R" Res-0402 4660,874.05 r270 top
R62 "0R" Res-0402 4724.88,635 r0 top
R63 "0R" Res-0402 5237.75,2772.94 r270 top
R64 "0R" Res-0402 5368.81,2624.85 r90 top
R65 "4.7K" Res-0402 4655.22,1532.3 r180 bottom
R66 "4.7K" Res-0402 4655.22,1684.2 r180 bottom
R67 "10K" Res-0402 4620.63,873.41 r90 top
R68 "3.3K" Res-0402 4828.83,812.24 r90 top
R69 "1K" Res-0402 4828.82,734.24 r90 top
R70 "DNP" Res-0402 4828.83,925.24 r270 top
R71 "5.1K" Res-0402 5315.5,1041.89 r0 bottom
R72 "5.1K" Res-0402 5315.5,1160 r0 bottom
R73 "1K" Res-0402 4591.71,5 r180 top
R74 "1K" RES-2512 4872.01,114.72 r0 top value=1kR
R75 "680R" Res-0402 4336.14,264.41 r0 top
R76 "10K" Res-0402 4724.88,590 r0 top
R77 "10K" Res-0402 4724.88,545.15 r0 top
R78 "10K" Res-0402 5300.39,2773.14 r90 top
R79 "10K" Res-0402 5368.81,2773.14 r90 top
R80 "10K" Res-0402 5174.02,2773.14 r270 top
R81 "10K" Res-0402 4477.83,2379.19 r270 top
R82 "10K" Res-0402 4413.02,2022.19 r270 top
R83 "10K" Res-0402 4433.01,2379.19 r270 top
R84 "0R" Res-0805 4035.43,236.85 r90 top
R85 "200K" RES-2512 4303.32,445.13 r180 bottom
R86 "6.2K" RES-2512 4303.53,240.07 r0 bottom
R87 "0R" Res-0805 4173.23,236.22 r90 top
R88 "220R" Res-0603 4664.35,2663.62 r90 top
R89 "10K" Res-0402 4805.92,2766.69 r180 top
R90 "10K" Res-0402 4804.92,2923.65 r180 top
R91 "0R" Res-0402 4675.62,2108.12 r270 top
R92 "0R" Res-0402 3343,3038.12 r90 top
R93 "0R" Res-0402 2543.71,2979.01 r90 top
R94 "0R" Res-0402 1743.71,2979.4 r90 top
R95 "0R" Res-0402 3517.13,3477.37 r90 top
R96 "0R" Res-0402 2717.13,3476.35 r90 top
R97 "0R" Res-0402 1917.13,3476.35 r90 top
R98 "51K" Res-2030 684.71,354.89 r180 top
R99 "51K" Res-2030 720,1880 r90 bottom
R100 "75R" Res-0603 3287.01,3477.4 r90 top
R101 "51K" Res-2030 684.71,727.12 r180 top
R102 "51K" Res-2030 908.82,1877.83 r90 top
R103 "51K" Res-2030 684.71,1099.36 r180 top
R104 "51K" Res-2030 1110,1880 r90 bottom
R105 "36K" Res-0603 3287.02,3476.88 r270 bottom
R106 "100R" Res-0603 3167.88,3133.47 r90 top
R107 "0R" Res-0603 3048.18,3132.95 r90 top
R108 "10K" Res-0603 3283.48,3133.47 r90 top value=10kR
R109 "4.7K" Res-0603 3404.44,3477.4 r90 top
R110 "10.5K" RES-2010 2478.2,2322.44 r90 top
R111 "10.5K" RES-2010 2638.2,2322.44 r90 top
R112 "10.5K" RES-2010 2798.36,2322.44 r270 top
R113 "1M" RES-2010 2638.2,2050.2 r270 top
R114 "1M" RES-2010 2804.87,2050.2 r270 top
R115 "51K" Res-2030 1880.31,1035.06 r90 top
R116 "51K" Res-2030 1689.61,1878.11 r90 top
R117 "75R" Res-0603 2487.02,3476.88 r90 top
R118 "51K" Res-2030 1129.98,1035.06 r90 top
R119 "51K" Res-2030 1299.22,1878.11 r90 top
R120 "51K" Res-2030 1505.15,1035.06 r90 top
R121 "51K" Res-2030 1500,1878.11 r90 bottom
R122 "36K" Res-0603 2487.02,3476.88 r270 bottom
R123 "100R" Res-0603 2367.88,3133.47 r90 top
R124 "0R" Res-0603 2248.18,3132.95 r90 top
R125 "10K" Res-0603 2483.48,3133.47 r90 top value=10kR
R126 "4.7K" Res-0603 2602.44,3477.4 r90 top
R127 "10.5K" RES-2010 1674.47,2322.44 r90 top
R128 "10.5K" RES-2010 1834.47,2322.45 r90 top
R129 "10.5K" RES-2010 1994.63,2322.44 r270 top
R130 "1M" RES-2010 1515,2322.45 r90 top
R131 "1M" RES-2010 1355,2322.46 r90 top
R132 "51K" Res-2030 2331,354.39 r0 top
R133 "51K" Res-2030 2280,1878.11 r90 bottom
R134 "75R" Res-0603 1687.01,3477.4 r90 top
R135 "51K" Res-2030 2331,726.63 r0 top
R136 "51K" Res-2030 2080,1878.11 r90 top
R137 "51K" Res-2030 2331,1098.87 r0 top
R138 "51K" Res-2030 1890,1877.83 r90 bottom
R139 "36K" Res-0603 1687.02,3476.88 r270 bottom
R140 "100R" Res-0603 1567.88,3133.47 r90 top
R141 "0R" Res-0603 1448.18,3132.95 r90 top
R142 "10K" Res-0603 1683.48,3133.47 r90 top value=10kR
R143 "4.7K" Res-0603 1802.44,3477.4 r90 top
R144 "10.5K" RES-2010 380,2632.44 r90 top
R145 "10.5K" RES-2010 540,2632.44 r90 top
R146 "10.5K" RES-2010 700.16,2632.44 r270 top
R147 "1M" RES-2010 215.52,2632.44 r90 top
R148 "1M" RES-2010 50,2635 r90 top
R149 "499R" Res-0603 3345.71,3477.38 r270 bottom
R150 "499R" Res-0603 1743.71,3477.38 r270 bottom
R151 "499R" Res-0603 2543.71,3477.38 r270 bottom
R152 "0R" Res-0402 3167.54,2887.23 r90 top
R153 "0R" Res-0402 2367.88,2887.23 r90 top
R154 "0R" Res-0402 1567.54,2887.23 r90 top
R155 "10K" Res-0402 3221.08,2887.23 r90 top
R156 "0R" Res-0603 3226.92,3133.47 r270 top
R157 "10K" Res-0402 1621.08,2887.23 r90 top
R158 "0R" Res-0603 1626.92,3133.47 r270 top
R159 "10K" Res-0402 2421.08,2887.23 r90 top
R160 "0R" Res-0603 2426.92,3133.47 r270 top
RV1 "471KD10J" 471KD10J 1174.77,438.6 r270 top
RV2 "471KD10J" 471KD10J 1505.15,438.6 r270 top
RV3 "471KD10J" 471KD10J 1835.52,438.6 r270 top
SB1 "Solder Bridge 0603" "Solder Bridge" 2789.01,1237.5 r0 top
TP1 "0.5mm Test Pad" "0.5mm Test Pad" 5337.28,334.61 r90 top
TP2 "0.5mm Test Pad" "0.5mm Test Pad" 5335.28,649.61 r180 top
U1 "ADE9000ACPZ" "40-LFCSP-WQ (6x6)" 3096.5,1313.5 r0 top
U2 "ISO7741DWR" SOIC-16-300mil 3830.93,1537.44 r270 top locked
U3 "NRF52840-QIAA-R" AQFN-73-EP(7x7) 4865.61,1542.14 r0 top locked
U4 "W25Q128JVEIQ" WSON-8-EP(6x8) 4334.99,1546.56 r90 top
U5 "TPS2117DRLR" SOT-583 4743.01,826.24 r90 top
U6 "TPS63031DSKR" "10-SON (2.5x2.5)" 4448.3,1021.22 r180 bottom
U7 "B0303S-1WR2" B0303S-1WR2 4060,910 r0 top
U8 "USBLC6-2SC6" SOT-23-6 5047,1091.5 r180 top
U9 "SLM6600" 8-SO-EP_ 4522.01,239.41 r0 top
U10 "MAX17048G+T10" "8-TDFN-EP (2x2)" 4836.02,530.31 r180 top
U11 "SHTC3-TR-2.5KS" "4-WDFN Exposed Pad" 5051.32,2680.75 r90 top
U12 "ADXL345BCCZ-RL7" "14-LGA (3x5)" 5221.26,2643.35 r90 top
U13 "ADS1115IDGSR" VSSOP-10 4406.71,2202.75 r90 top
U14 "TLI4971-A120T5-U-E0001" TISON-8(8X8) 4577.59,2918.06 r90 top
U15 "AFE3010AIRGTR" VQFN-16(3x3) 3253.93,3307.09 r0 top
U16 "AFE3010AIRGTR" VQFN-16(3x3) 2453.93,3307.09 r0 top
U17 "AFE3010AIRGTR" VQFN-16(3x3) 1653.51,3306.97 r0 top
X1 "24.576MHz" SMD3225-4P 3346.5,1402.4 r90 top
X2 "32.768KHz" SMD3215-2P 4635,1611.35 r270 top locked
X3 "32MHz" SMD2016-4P 4993,1762.13 r180 top

## Footprints (in the part's own frame and the unit in brackets; to place one, negate y for a bottom-side part, rotate by r counter-clockwise, add the part's x,y. Pads: shape width x height; smd on the part's side, far side on the other; paste and mask are expansions set on the pad)
"0.5mm Test Pad" [mm]
  round 4 hole 2: 1(0,0)
"4-WDFN Exposed Pad" [mm]
  rect 0.57x0.38 smd paste+0 mask+0.051: 1(-0.95,0.5) 2(-0.95,-0.5) 3(0.95,-0.5) 4(0.95,0.5)
  rect 0.7x1.6 smd paste+0 mask+0.051: 5(0,0)
  silkscreen extent -1.48,-1.04 0.99,1.04, body extent -1,-1 1,1, height 0.76
8-SO-EP_ [mm]
  rect 1.505x0.802 smd: 1(-2.497,1.905) 2(-2.497,0.635) 3(-2.497,-0.635) 4(-2.497,-1.905) 5(2.498,-1.905) 6(2.498,-0.635) 7(2.498,0.635) 8(2.498,1.905)
  rect 2.613x3.502 smd: 9(0,0)
  silkscreen extent -3.53,-2.51 2.03,2.51, body extent -3,-2.45 3,2.45, height 1.7
"8-TDFN-EP (2x2)" [mm]
  rect 0.7x0.3 smd: 1(-0.99,0.75) 2(-0.99,0.25) 3(-0.99,-0.25) 4(-0.99,-0.75) 5(0.99,-0.75) 6(0.99,-0.25) 7(0.99,0.25) 8(0.99,0.75)
  rect 0.8x1.38 smd: 9(0,0)
  silkscreen extent -1.63,-1.1 1.05,1.1, body extent -1.05,-1.05 1.05,1.05, height 0.81
"10-SON (2.5x2.5)" [mm]
  rect 0.84x0.27 smd mask+0.07: 1(-1.195,1) 2(-1.195,0.5) 3(-1.195,0) 4(-1.195,-0.5) 5(-1.195,-1) 6(1.195,-1) 7(1.195,-0.5) 8(1.195,0) 9(1.195,0.5) 10(1.195,1)
  rect 1.2x2 smd paste-2 mask+0.07: 11(0,0)
  silkscreen extent -1.88,-1.33 1.25,1.33, body extent -1.25,-1.25 1.25,1.25, height 0.8
"14-LGA (3x5)" [mm]
  rect 0.92x0.61 smd mask+0.05: 1(-1.01,2) 2(-1.01,1.2) 3(-1.01,0.4) 4(-1.01,-0.4) 5(-1.01,-1.2) 6(-1.01,-2) 8(1.01,-2) 9(1.01,-1.2) 10(1.01,-0.4) 11(1.01,0.4) 12(1.01,1.2) 13(1.01,2)
  rect 0.61x0.92 smd mask+0.05: 7(0,-2.01) 14(0,2.01)
  silkscreen extent -1.78,-2.57 1.5,2.57, body extent -1.5,-2.5 1.5,2.5, height 1
20SVPF120M [mm]
  rect 3.5x1.6 smd: 1(-2.8,0) 2(2.8,0)
  silkscreen extent -4.11,-3.3 3.3,3.3, body extent -3.65,-3.3 3.65,3.3, height 5.9
"40-LFCSP-WQ (6x6)" [mm]
  rect 0.665x0.28 smd paste-100 mask+0.051: 1(-2.908,2.25) 2(-2.908,1.75) 3(-2.908,1.25) 4(-2.908,0.75) 5(-2.908,0.25) 6(-2.908,-0.25) 7(-2.908,-0.75) 8(-2.908,-1.25) 9(-2.908,-1.75) 10(-2.908,-2.25) 21(2.908,-2.25) 22(2.908,-1.75) 23(2.908,-1.25) 24(2.908,-0.75) 25(2.908,-0.25) 26(2.908,0.25) 27(2.908,0.75) 28(2.908,1.25) 29(2.908,1.75) 30(2.908,2.25)
  rect 0.28x0.665 smd paste-100 mask+0.051: 11(-2.25,-2.908) 12(-1.75,-2.908) 13(-1.25,-2.908) 14(-0.75,-2.908) 15(-0.25,-2.908) 16(0.25,-2.908) 17(0.75,-2.908) 18(1.25,-2.908) 19(1.75,-2.908) 20(2.25,-2.908) 31(2.25,2.908) 32(1.75,2.908) 33(1.25,2.908) 34(0.75,2.908) 35(0.25,2.908) 36(-0.25,2.908) 37(-0.75,2.908) 38(-1.25,2.908) 39(-1.75,2.908) 40(-2.25,2.908)
  rect 4.42x4.42 smd paste-100 mask+0.051: 41(0,0)
  silkscreen extent -3.52,-3.08 3.08,3.08, body extent -3.01,-3.01 3.01,3.01, height 0.82
471KD10J [mm]
  round 2 hole 1.2 paste-2539.97 mask+0.051: 1(-3.749,1.1) 2(3.749,-1.1)
  silkscreen extent -6.32,-3.02 6.3,3.02, body extent -6.25,-2.95 6.25,2.95, height 13.75
ANT-1206 [mm]
  rect 1.1x1.5 smd: 1(-1.9,0) 2(1.9,0)
  silkscreen extent -2.89,-0.86 1.12,0.84, body extent -1.6,-0.8 1.6,0.8, height 1
AQFN-73-EP(7x7) [mm]
  rect 4.85x4.85 smd paste-3: 74(0,0)
  round 0.275 smd: A8(-1.25,3.25) A10(-0.75,3.25) A12(-0.25,3.25) A14(0.25,3.25) A16(0.75,3.25) A18(1.25,3.25) A20(1.75,3.25) A22(2.25,3.25) A23(2.75,3.25) AA24(3.25,-2.25) AB2(-2.75,-2.5) AC5(-2,-2.75) AC9(-1,-2.75) AC11(-0.5,-2.75) AC13(0,-2.75) AC15(0.5,-2.75) AC17(1,-2.75) AC19(1.5,-2.75) AC21(2,-2.75) AC24(3.25,-2.75) AD2(-2.75,-3.25) AD4(-2.25,-3.25) AD6(-1.75,-3.25) AD8(-1.25,-3.25) AD10(-0.75,-3.25) AD12(-0.25,-3.25) AD14(0.25,-3.25) AD16(0.75,-3.25) AD18(1.25,-3.25) AD20(1.75,-3.25) AD22(2.25,-3.25) AD23(2.75,-3.25) B1(-3.25,2.75) B3(-2.5,2.75) B5(-2,2.75) B7(-1.5,2.75) B9(-1,2.75) B11(-0.5,2.75) B13(0,2.75) B15(0.5,2.75) B17(1,2.75) B19(1.5,2.75) B24(3.25,2.75) C1(-3.25,2.25) D2(-2.75,2) D23(2.75,2) E24(3.25,1.75) F2(-2.75,1.5) F23(2.75,1.5) G1(-3.25,1.25) H2(-2.75,1) H23(2.75,1) J1(-3.25,0.75) J24(3.25,0.75) K2(-2.75,0.5) L1(-3.25,0.25) L24(3.25,0.25) M2(-2.75,0) N1(-3.25,-0.25) N24(3.25,-0.25) P2(-2.75,-0.5) P23(2.75,-0.5) R1(-3.25,-0.75) R24(3.25,-0.75) T2(-2.75,-1) T23(2.75,-1) U1(-3.25,-1.25) U24(3.25,-1.25) V23(2.75,-1.5) W1(-3.25,-1.75) W24(3.25,-1.75) Y2(-2.75,-2) Y23(2.75,-2)
  silkscreen extent -4.02,-3.5 3.5,3.5, body extent -3.5,-3.5 3.5,3.5, height 0.85
B0303S-1WR2 [mm]
  rect 1.8x1.8 hole 0.9 paste-2539.97 mask+0.051: 1(-3.81,0)
  round 1.8 hole 0.9 paste-2539.97 mask+0.051: 2(-1.27,0) 3(1.27,0) 4(3.81,0)
  silkscreen extent -5.79,-0.91 5.82,5.11, body extent -5.8,-0.92 5.8,5.08, height 10.16
"Cap 1808" [mm]
  rect 1.785x2.16 smd paste+0 mask+0.051: 1(-2.093,0) 2(2.093,0)
  silkscreen extent -3.21,-1.31 3.21,1.31, body extent -2.3,-1 2.3,1, height 1.45
"Cap 2220" [mm]
  rect 1.2x5.2 smd: 1(-2.6,0) 2(2.6,0)
  silkscreen extent -3.33,-2.75 3.33,2.75, body extent -2.85,-2.5 2.85,2.5, height 2.24
Cap-0402 [mil]
  rect 18x25 smd mask+2.36: 1(-18.5,0) 2(18.5,0)
  silkscreen extent -31,-16 31,16, body extent -20,-10 20,10, height 19
Cap-0603 [mil]
  rect 30x35 smd mask+2.36: 1(-30,0) 2(30,0)
  silkscreen extent -49,-21 49,21, body extent -32,-16 31,16, height 34
Cap-0805 [mil] "SMD 0805"
  rect 40x60 smd mask+2.76: 1(-40,0) 2(40,0)
  silkscreen extent -64,-34 64,34, body extent -39,-25 39,25, height 30
Cap-1206 [mil] "SMD 1206"
  rect 60x70 smd: 1(-50,0) 2(50,0)
  silkscreen extent -84,-39 84,39, body extent -63,-31 63,32, height 39
D2PAK [mm]
  rect 2.08x3.81 smd: 1(-2.54,-5.335) 3(2.54,-5.335)
  rect 11.43x8.89 smd: 2(0,5.335)
  silkscreen extent -5.21,-5.46 5.11,0.51, body extent -5.08,-6.6 5.02,8.79, height 4.5
DB2ERM-5.08-12P-GN [mm]
  rect 2.8x2.8 hole 1.9: 1(-27.94,0)
  round 2.8 hole 1.9: 2(-22.86,0) 3(-17.78,0) 4(-12.7,0) 5(-7.62,0) 6(-2.54,0) 7(2.54,0) 8(7.62,0) 9(12.7,0) 10(17.78,0) 11(22.86,0) 12(27.94,0)
  silkscreen extent -35.64,-10 35.64,2, body extent -35.56,-10 35.56,2, height 8.5
DB2ERM-5.08-14P-GN [mm]
  rect 3x3 hole 1.9 paste-2539.97 mask+0.051: 1(-33.02,0)
  round 3 hole 1.9 paste-2539.97 mask+0.051: 2(-27.94,0) 3(-22.86,0) 4(-17.78,0) 5(-12.7,0) 6(-7.62,0) 7(-2.54,0) 8(2.54,0) 9(7.62,0) 10(12.7,0) 11(17.78,0) 12(22.86,0) 13(27.94,0) 14(33.02,0)
  silkscreen extent -40.64,-3.84 40.64,2, body extent -40.64,-10 40.64,2, height 8.5
DB136H-10.16-1P-BK-P [mm]
  rect 3.5x3.5 hole 2: 1(0,-5.08)
  round 3.5 hole 2: 1(0,5.08)
  silkscreen extent -5.08,-8.28 5.08,13.72, body extent -5.09,-8.36 5.82,13.64, height 30.8
DB136H-10.16-1P-RD-P [mm]
  rect 3.5x3.5 hole 2: 1(0,-5.08)
  round 3.5 hole 2: 1(0,5.08)
  silkscreen extent -5.08,-8.28 5.08,13.72, body extent -5.09,-8.36 5.82,13.64, height 30.8
IND-0201 [mm]
  rect 0.25x0.3 smd mask+0.055: 1(-0.275,0) 2(0.275,0)
  silkscreen extent -0.48,-0.23 0.48,0.23, body extent -0.3,-0.15 0.3,0.15, height 0.15
IND-0402 [mm]
  rect 0.4x0.6 smd: 1(-0.35,0) 2(0.35,0)
  silkscreen extent -0.71,-0.46 0.71,0.46, body extent -0.5,-0.25 0.5,0.25, height 0.25
"IND-0603 (1608 Metric)" [mm] "0.063\" L x 0.032\" W (1.60mm x 0.80mm)"
  rect 0.6x0.8 smd: 1(-0.7,0) 2(0.7,0)
  silkscreen extent -0.2,-0.46 0.23,0.46, body extent -0.8,-0.4 0.8,0.4, height 0.78
Ind-0805 [mm] "Inductor 0805"
  rect 1.2x1.32 smd: 1(-1,0) 2(1,0)
  silkscreen extent -0.25,-0.69 0.25,0.69, body extent -1,-0.62 1,0.63, height 0.47
LED-0603 [mm]
  rect 0.5x1 smd: 1(-0.75,0) 2(0.75,0)
  silkscreen extent -1.12,-0.66 1.75,0.66, body extent -0.82,-0.37 0.82,0.36, height 0.68
LVT303012-1R5M-N [mm]
  rect 1.5x3.32 smd paste+0 mask+0.051: 1(1.328,0) 2(-1.328,0)
  silkscreen extent -0.38,-1.55 0.38,1.55, body extent -1.51,-1.5 1.51,1.5, height 1.51
Res-0402 [mil]
  rect 18x25 smd mask+2.17: 1(-18.5,0) 2(18.5,0)
  silkscreen extent -32,-17 32,16, body extent -23,-11 23,11, height 16
Res-0603 [mil]
  rect 30x35 smd: 1(-30,0) 2(30,0)
  silkscreen extent -48,-21 48,21, body extent -31,-17 31,17, height 18
Res-0805 [mil] "SMD 0805"
  rect 40x50 smd: 1(-40,0) 2(40,0)
  silkscreen extent -64,-29 64,29, body extent -39,-25 39,24, height 24
RES-2010 [mm]
  rect 0.9x2.8 smd: 1(-2.35,0) 2(2.35,0)
  silkscreen extent -2.92,-1.52 2.92,1.52, body extent -2.5,-1.25 2.5,1.25, height 0.6
Res-2030 [mm]
  rect 2.5x7.8 smd paste+0 mask+0.051: 1(-3,0) 2(3,0)
  silkscreen extent -4.45,-4.1 4.45,4.1, body extent -2.55,-3.8 2.55,3.8, height 1.2
RES-2512 [mm]
  rect 1.6x3.4 smd: 1(-3.25,0) 2(3.25,0)
  silkscreen extent -4.24,-1.85 4.24,1.85, body extent -3.17,-1.63 3.18,1.63, height 0.58
SMA(DO-214AC) [mm]
  rect 1.6x2.8 smd: 1(-1.9,0) 2(1.9,0)
  silkscreen extent -3.99,-1.6 2.84,1.6, body extent -2.6,-1.45 2.6,1.45, height 2.3
SMD2016-4P [mm]
  rect 1x0.8 smd paste+0 mask+0.051: 1(-0.75,-0.6) 2(0.75,-0.6) 3(0.75,0.6) 4(-0.75,0.6)
  silkscreen extent -1.42,-0.84 1.04,0.84, body extent -1,-0.8 1,0.8, height 0.47
SMD3215-2P [mm]
  rect 1x1.8 smd: 1(-1.25,0) 2(1.25,0)
  silkscreen extent -0.56,-0.81 0.56,0.81, body extent -1.6,-0.75 1.6,0.75, height 0.8
SMD3225-4P [mm]
  rect 1.4x1.2 smd: 1(-1.1,-0.85) 2(1.1,-0.85) 3(1.1,0.85) 4(-1.1,0.85)
  silkscreen extent -2.08,-1.3 1.65,1.3, body extent -1.6,-1.25 1.6,1.25, height 0.81
SOD323F [mm]
  rect 0.6x0.6 smd: 1(-1.05,0) 2(1.05,0)
  silkscreen extent -0.91,-0.79 2.11,0.79, body extent -1.25,-0.67 1.25,0.68, height 1
SOIC-16-300mil [mm]
  rect 1.65x0.6 smd paste+0 mask+0.07: 1(-4.875,4.445) 2(-4.875,3.175) 3(-4.875,1.905) 4(-4.875,0.635) 5(-4.875,-0.635) 6(-4.875,-1.905) 7(-4.875,-3.175) 8(-4.875,-4.445) 9(4.875,-4.445) 10(4.875,-3.175) 11(4.875,-1.905) 12(4.875,-0.635) 13(4.875,0.635) 14(4.875,1.905) 15(4.875,3.175) 16(4.875,4.445)
  silkscreen extent -6,-5.21 3.84,5.21, body extent -5.15,-5.15 5.15,5.15, height 2.65
"Solder Bridge" [mil] "Solder Bridge ON"
  rect 30x35 smd: 1(-30,0) 2(30,0)
  silkscreen extent -50,-22 50,22
SOT-23 [mm] "TRANS NPN 40V 0.6A SOT23"
  rect 0.82x0.92 smd: 1(-0.95,-1) 2(0.95,-1) 3(0,1)
  silkscreen extent -1.68,-1.3 1.55,0.81, body extent -1.5,-1.25 1.5,1.25, height 1.05
SOT-23-6 [mm]
  rect 1.22x0.62 smd: 1(-1.31,0.95) 2(-1.31,0) 3(-1.31,-0.95) 4(1.31,-0.95) 5(1.31,0) 6(1.31,0.95)
  silkscreen extent -2.18,-1.52 0.86,1.52, body extent -1.5,-1.5 1.5,1.5, height 1.47
SOT-323-5 [mm]
  rect 1x0.35 smd: 1(-0.95,0.65) 2(-0.95,0) 3(-0.95,-0.65) 4(0.95,-0.65) 5(0.95,0.65)
  silkscreen extent -1.73,-1.12 0.51,1.12, body extent -1.05,-1.05 1.05,1.05, height 1
SOT-523 [mm]
  rect 0.4x0.51 smd: 1(-0.5,-0.645) 2(0.5,-0.645) 3(0,0.645)
  silkscreen extent -0.97,-0.76 0.86,0.46, body extent -0.8,-0.8 0.8,0.8, height 0.8
SOT-583 [mm]
  rect 0.67x0.32 smd mask+0.055: 1(-0.735,0.75) 2(-0.735,0.25) 3(-0.735,-0.25) 4(-0.735,-0.75) 5(0.735,-0.75) 6(0.735,-0.25) 7(0.735,0.25) 8(0.735,0.75)
  silkscreen extent -1.32,-1.1 0.6,1.1, body extent -0.8,-1.05 0.8,1.05, height 0.6
TC2030-IDC_ [mm] "CABLE ADAPTER 6 POS"
  round 0.787 smd: 1(-1.27,-0.635) 1(-1.27,-0.635) 2(-1.27,0.635) 3(0,-0.635) 4(0,0.635) 5(1.27,-0.635) 6(1.27,0.635)
  round 0 hole 2.375 unplated: MP1(-2.54,-2.54) MP2(0.635,-2.54) MP3(0.635,2.54) MP4(-2.54,2.54)
  round 0 hole 0.991 unplated: MP5(-2.54,0) MP6(2.54,-1.016) MP7(2.54,1.016)
  silkscreen extent -3.86,-3.86 3.2,3.86
TISON-8(8X8) [mm]
  rect 1.6x1.5 smd: 1(-3.364,3) 6(-3.364,-3)
  rect 1.6x0.5 smd: 2(-3.364,1.5) 3(-3.364,0.5) 4(-3.364,-0.5) 5(-3.364,-1.5)
  oval 0.5x0.3 smd: 7(3.364,-1.556) 8(3.364,1.556)
  Top Layer region: 1.514,-4.092 1.514,-1.257 3.203,-1.257 3.203,0.98 5.214,0.98 5.214,-4.092 1.514,-4.092
  Top Layer region: 5.214,4.092 5.214,1.257 2.964,1.257 2.964,-0.98 1.514,-0.98 1.514,4.092 5.214,4.092
  silkscreen extent -4.5,-4.04 1.27,4.05, body extent -3.41,-4 4.59,4, height 1.07
TSSOP-4(5.0x4.4) [mm]
  rect 0.85x1.55 smd: 1(-2,-2.95) 2(2,-2.95) 3(2,2.95) 4(-2,2.95)
  silkscreen extent -2.58,-1.93 2.58,1.65, body extent -2.5,-3.25 2.5,3.25, height 1.4
TYPE-C-31-M-12_ [mm]
  rect 0.6x1.2 smd: A1/B12(-3.2,2.375) A4/B9(-2.4,2.375) B1/A12(3.2,2.375) B4/A9(2.4,2.375)
  rect 0.3x1.2 smd: A5(-1.25,2.375) A6(-0.25,2.375) A7(0.25,2.375) A8(1.25,2.375) B5(1.75,2.375) B6(0.75,2.375) B7(-0.75,2.375) B8(-1.75,2.375)
  round 0 hole 0.62 unplated: MH(-2.89,1.305) MH(2.89,1.305)
  oval 0.9x2 hole 0.6 slot 1.7 at 90 deg: S1(4.325,1.805) S4(-4.325,1.805)
  oval 0.9x1.7 hole 0.6 slot 1.4 at 90 deg: S2(4.325,-2.375) S3(-4.325,-2.375)
  silkscreen extent -4.5,-3.57 4.5,0.44, body extent -4.47,-5.01 4.47,2.89, height 3.31
UD2C100M0810 [mm]
  rect 4.2x1.4 smd paste+0 mask+0.051: 1(-3.267,0) 2(3.267,0)
  silkscreen extent -5.12,-4.23 4.2,4.23, body extent -5,-4.15 5,4.15, height 10.05
VQFN-16(3x3) [mm]
  rect 0.6x0.25 smd paste-100 mask+0.051: 1(-1.5,0.748) 2(-1.5,0.249) 3(-1.5,-0.252) 4(-1.5,-0.751) 9(1.5,-0.75) 10(1.5,-0.25) 11(1.5,0.25) 12(1.5,0.748)
  rect 0.25x0.6 smd paste-100 mask+0.051: 5(-0.748,-1.5) 6(-0.248,-1.5) 7(0.252,-1.5) 8(0.752,-1.5) 13(0.752,1.5) 14(0.252,1.5) 15(-0.248,1.5) 16(-0.748,1.5)
  rect 1.5x1.5 smd paste-100 mask+0.051: 17(0,0)
  silkscreen extent -2.03,-1.5 1.5,1.5, body extent -1.51,-1.5 1.49,1.5, height 1
VSSOP-10 [mm]
  rect 1.45x0.3 smd paste+0 mask+0.05: 1(-2.2,1) 2(-2.2,0.5) 3(-2.2,0) 4(-2.2,-0.5) 5(-2.2,-1) 6(2.2,-1) 7(2.2,-0.5) 8(2.2,0) 9(2.2,0.5) 10(2.2,1)
  silkscreen extent -3.17,-1.55 1.47,1.55, body extent -2.45,-1.5 2.45,1.5, height 1.07
WSON-8-EP(6x8) [mm]
  rect 1.2x0.6 smd: 1(-3.8,1.905) 2(-3.8,0.635) 3(-3.8,-0.635) 4(-3.8,-1.905) 5(3.8,-1.905) 6(3.8,-0.635) 7(3.8,0.635) 8(3.8,1.905)
  rect 3.4x4.3 smd: 9(0,0)
  silkscreen extent -4.72,-3 4,3, body extent -4,-3 4,3, height 0.8
YSPI0520-2R2M_ [mm]
  rect 2x2.5 smd: 1(-2.5,0) 2(2.5,0)
  silkscreen extent -2.7,-2.6 2.7,2.6, body extent -2.7,-2.6 2.7,2.6, height 1.8

## Part data
ANT1: "RF ANT 2.4GHZ CHIP SOLDER SMD", Manufacturer=Johanson, Category="RF Antennas", ComponentLink1Description=https://datasheet.ciiva.com/24025/antenna-2450at18b100-242422-24025839.pdf?src-supplier=Mouser, ComponentLink1URL=https://datasheet.ciiva.com/24025/antenna-2450at18b100-242422-24025839.pdf?src-supplier=Mouser, ComponentLink2Description=https://datasheet.ciiva.com/1124/1318299-1124918.pdf?src-supplier=Element14, ComponentLink2URL=https://datasheet.ciiva.com/1124/1318299-1124918.pdf?src-supplier=Element14, Manufacturer Part Number=2450AT18B100E, Pricing="3000=0.3724, 6000=0.3688, 9000=0.3651, 12000=0.3615, 15000=0.3579, 30000=0.3542 (USD)", RoHS=Yes, Stock=792000, Supplier="Arrow Electronics", Supplier Part Number=2450AT18B100E
BR1 BR2 BR3: "BRIDGE RECT 1P 600V 1A 4MICRODIP", LCSC Part Number=C895500, Manufacturer="ON Semiconductor / Fairchild", ComponentLink1Description=https://datasheet.ciiva.com/4433/mdb6s-195692-4433151.pdf?src-supplier=Mouser, ComponentLink1URL=https://datasheet.ciiva.com/4433/mdb6s-195692-4433151.pdf?src-supplier=Mouser, ComponentLink2Description=https://datasheet.ciiva.com/11195/mdb8s-11195777.pdf?src-supplier=Avnet, ComponentLink2URL=https://datasheet.ciiva.com/11195/mdb8s-11195777.pdf?src-supplier=Avnet, ComponentLink3Description=https://datasheet.ciiva.com/30480/0900766b81185ceb-30480759.pdf?src-supplier=Rs, ComponentLink3URL=https://datasheet.ciiva.com/30480/0900766b81185ceb-30480759.pdf?src-supplier=Rs, ComponentLink4Description=https://datasheet.ciiva.com/6390/mdb10s-6390582.pdf?src-supplier=Digikey, ComponentLink4URL=https://datasheet.ciiva.com/6390/mdb10s-6390582.pdf?src-supplier=Digikey, ComponentLink5Description=https://datasheet.ciiva.com/6390/mdb10s-6390583.pdf?src-supplier=Digikey, ComponentLink5URL=https://datasheet.ciiva.com/6390/mdb10s-6390583.pdf?src-supplier=Digikey, ComponentLink6Description=https://datasheet.ciiva.com/6390/mdb10s-6390584.pdf?src-supplier=Digikey, ComponentLink6URL=https://datasheet.ciiva.com/6390/mdb10s-6390584.pdf?src-supplier=Digikey, Item Type=Diodes, Lead Free=5697LeadFree, Manufacturer Part Number=MDB6S, Pricing="5000=0.128, 10000=0.126, 15000=0.125 (USD)", RoHS=Yes, Stock=170000, Supplier="Future Electronics"
C1 C2 C3 C4 C5 C6 C7 C8 C11 C12 C13 C14: library part GRM21B5C1H223JA01L, "CAP CER 0.022UF 50V C0G/NP0 0805", LCSC Part Number=C77069, Manufacturer=Murata, ComponentLink1Description=https://datasheet.ciiva.com/29042/1858738-29042965.pdf?src-supplier=Jameco, ComponentLink1URL=https://datasheet.ciiva.com/29042/1858738-29042965.pdf?src-supplier=Jameco, ComponentLink2Description=https://datasheet.ciiva.com/2989/product-2989681.pdf?src-supplier=Avnet, ComponentLink2URL=https://datasheet.ciiva.com/2989/product-2989681.pdf?src-supplier=Avnet, ComponentLink3Description=https://datasheet.ciiva.com/3777/99grm21b5c1h223ja0123-3777023.pdf?src-supplier=Arrow+Electronics, ComponentLink3URL=https://datasheet.ciiva.com/3777/99grm21b5c1h223ja0123-3777023.pdf?src-supplier=Arrow+Electronics, ComponentLink4Description=https://datasheet.ciiva.com/29200/453051-da-01-en-vs-kondensator-0805-29200670.pdf?src-supplier=Conrad, ComponentLink4URL=https://datasheet.ciiva.com/29200/453051-da-01-en-vs-kondensator-0805-29200670.pdf?src-supplier=Conrad, ComponentLink5Description=https://datasheet.ciiva.com/138/partnumbering-e-01-138787.pdf?src-supplier=Digikey, ComponentLink5URL=https://datasheet.ciiva.com/138/partnumbering-e-01-138787.pdf?src-supplier=Digikey, ComponentLink6Description=https://datasheet.ciiva.com/138/partnumbering-e-01-138788.pdf?src-supplier=Digikey, ComponentLink6URL=https://datasheet.ciiva.com/138/partnumbering-e-01-138788.pdf?src-supplier=Digikey, ComponentLink7Description=https://datasheet.ciiva.com/138/partnumbering-e-01-138789.pdf?src-supplier=Digikey, ComponentLink7URL=https://datasheet.ciiva.com/138/partnumbering-e-01-138789.pdf?src-supplier=Digikey, ComponentLink8Description=https://datasheet.ciiva.com/22703/608985-22703464.pdf?src-supplier=Element14, ComponentLink8URL=https://datasheet.ciiva.com/22703/608985-22703464.pdf?src-supplier=Element14, ComponentLink9Description=https://datasheet.ciiva.com/7828/608985-7828990.pdf?src-supplier=Element14, ComponentLink9URL=https://datasheet.ciiva.com/7828/608985-7828990.pdf?src-supplier=Element14, Item Type=Capacitors, Lead Free=5697LeadFree, Manufacturer Part Number=GRM21B5C1H223JA01L, Pricing="1=0.38, 10=0.162, 50=0.162, 100=0.108, 1000=0.089, 10000=0.065 (USD)", RoHS=Yes, Stock=33939, Supplier=Mouser
C9 C10: library part CC0603JRNPO9BN150, "CAP CER 15PF 50V C0G/NPO 0603", Case Code (Imperial)=0603, Case Code (Metric)=1608, Dielectric=C0G, Dielectric Material=Ceramic, Insulation Resistance=100GR, LCSC Part Number=C107037, Manufacturer=Yageo, Max Operating Temperature=125°C, Min Operating Temperature=-55°C, Package Quantity=1, Supplier Part Number 1=4234670, Tolerance=5%, Voltage Rating=50V, Case/Package=0603, Category="Ceramic Capacitors", ComponentLink1Description=https://datasheet.ciiva.com/144/mlccorderingcode-144635.pdf?src-supplier=Digi-Key, ComponentLink1URL=https://datasheet.ciiva.com/144/mlccorderingcode-144635.pdf?src-supplier=Digi-Key, ComponentLink2Description=https://datasheet.ciiva.com/144/mlccorderingcode-144636.pdf?src-supplier=Digi-Key, ComponentLink2URL=https://datasheet.ciiva.com/144/mlccorderingcode-144636.pdf?src-supplier=Digi-Key, ComponentLink3Description=https://datasheet.ciiva.com/8033/1443161-8033721.pdf?src-supplier=Element14, ComponentLink3URL=https://datasheet.ciiva.com/8033/1443161-8033721.pdf?src-supplier=Element14, ComponentLink4Description=https://datasheet.ciiva.com/28450/1443161-28450472.pdf?src-supplier=Element14, ComponentLink4URL=https://datasheet.ciiva.com/28450/1443161-28450472.pdf?src-supplier=Element14, ComponentLink5Description=https://datasheet.ciiva.com/144/mlccorderingcode-144634.pdf?src-supplier=Digi-Key, ComponentLink5URL=https://datasheet.ciiva.com/144/mlccorderingcode-144634.pdf?src-supplier=Digi-Key, ComponentLink6Description=https://datasheet.ciiva.com/8033/1734582-8033723.pdf?src-supplier=Element14, ComponentLink6URL=https://datasheet.ciiva.com/8033/1734582-8033723.pdf?src-supplier=Element14, ComponentLink7Description=https://datasheet.ciiva.com/8033/1734582-8033722.pdf?src-supplier=Element14, ComponentLink7URL=https://datasheet.ciiva.com/8033/1734582-8033722.pdf?src-supplier=Element14, ComponentLink8Description=https://datasheet.ciiva.com/11464/upy-gp-np0-16v-to-50v-8-11464727.pdf?src-supplier=Avnet, ComponentLink8URL=https://datasheet.ciiva.com/11464/upy-gp-np0-16v-to-50v-8-11464727.pdf?src-supplier=Avnet, Depth=0.8mm, Height=0.8mm, Item Type=Capacitor, Lead Free="Lead Free", Length=1.6mm, Manufacturer Part Number=CC0603JRNPO9BN150, Mounting Technology="Surface Mount", Packaging="Tape and Reel", Pins=2, Pricing 1="4000=0.0038, 16000=0.0036, 80000=0.0034, 160000=0.0033, 500000=0.0031 (USD)", Radiation Hardening=No, Reach SVHC Compliant=No, RoHS=Yes, RoHS Compliant=Yes, Series=CC, Stock 1=832000, Supplier 1="Future Electronics", Termination=SMD/SMT, Thickness=0.035inch, Width=0.031inch
C15 C16 C17 C18 C20 C22 C24: library part GCJ188R71H104KA12D, "CAP CER 0.1UF 50V X7R 0603", Case Code (Imperial)=0603, Case Code (Metric)=1608, Dielectric=X7R, LCSC Part Number=C161115, Manufacturer=Murata, Max Operating Temperature=125°C, Min Operating Temperature=-55°C, Package Quantity=1, Ratings=AEC-Q200, Tolerance=10%, Voltage Rating=50V, Case/Package=0603, ComponentLink1Description=https://datasheet.ciiva.com/135/product-135604.pdf?src-supplier=Digikey, ComponentLink1URL=https://datasheet.ciiva.com/135/product-135604.pdf?src-supplier=Digikey, ComponentLink2Description=https://datasheet.ciiva.com/26889/getdatasheetpartid-369886-26889118.pdf?src-supplier=Verical, ComponentLink2URL=https://datasheet.ciiva.com/26889/getdatasheetpartid-369886-26889118.pdf?src-supplier=Verical, ComponentLink3Description=https://datasheet.ciiva.com/135/s0717e-135605.pdf?src-supplier=Digikey, ComponentLink3URL=https://datasheet.ciiva.com/135/s0717e-135605.pdf?src-supplier=Digikey, ComponentLink4Description=https://datasheet.ciiva.com/135/s0717e-135606.pdf?src-supplier=Digikey, ComponentLink4URL=https://datasheet.ciiva.com/135/s0717e-135606.pdf?src-supplier=Digikey, ComponentLink5Description=https://datasheet.ciiva.com/16440/c03e-16440425.pdf?src-supplier=Future+Electronics, ComponentLink5URL=https://datasheet.ciiva.com/16440/c03e-16440425.pdf?src-supplier=Future+Electronics, Construction=Flat, Depth=0.8mm, Features="Soft Termination", Height=0.8mm, Item Type=Capacitors, Lead Free=5697LeadFree, Length=1.6mm, Manufacturer Part Number=GCJ188R71H104KA12D, Material=4241ConductorMaterial, Mounting Technology="Surface Mount", Packaging="Tape and Reel", Pricing="1=0.13, 10=0.056, 50=0.056, 100=0.036, 1000=0.032, 10000=0.02 (USD)", Radiation Hardening=No, RoHS=Yes, RoHS Compliant=Yes, Series=GCJ, Stock=342536, Supplier=Mouser, Termination=SMD/SMT, Thickness=0.035inch, Voltage Rating (DC)=50V, Width=0.031inch
C19 C21 C23 C25: library part GRM188Z71A475KE15D, "CAP CER 4.7UF 10V X7R 0603", Case/Package=0603, LCSC Part Number=C913474, Manufacturer=Murata, Max Operating Temperature=125°C, Min Operating Temperature=-55°C, Tolerance=10%, Voltage Rating=10V, ComponentLink1Description=https://datasheet.octopart.com/GRM188Z71A475KE15D-Murata-datasheet-149523299.pdf?src-supplier=Newark, ComponentLink1URL=https://datasheet.octopart.com/GRM188Z71A475KE15D-Murata-datasheet-149523299.pdf?src-supplier=Newark, ComponentLink2Description=https://datasheet.octopart.com/GRM188Z71A475KE15D-Murata-datasheet-165579666.pdf?src-supplier=TME, ComponentLink2URL=https://datasheet.octopart.com/GRM188Z71A475KE15D-Murata-datasheet-165579666.pdf?src-supplier=TME, Height=950um, Item Type=Capacitors, Length=1.6mm, Manufacturer Part Number=GRM188Z71A475KE15D, Material=4241ConductorMaterial, Pricing="1=0.24, 10=0.1, 50=0.1, 100=0.063, 1000=0.055, 10000=0.041 (USD)", RoHS=Yes, RoHS Compliant=Yes, Stock=33218, Supplier=Mouser, Thickness=800um, Width=800um
C26 C29 C32: library part GQM1875C2E510FB12D, "51 pF ±1% 250V Ceramic Capacitor C0G, NP0 0603 (1608 Metric)", LCSC Part Number=C17504198, Manufacturer=Murata, Item Type=Capacitors, Manufacturer Part Number=GQM1875C2E510FB12D, Pricing="1=0.58, 10=0.26, 50=0.26, 100=0.181, 1000=0.16, 10000=0.122 (USD)", RoHS=Yes, Stock=1634, Supplier=Mouser
C27 C28 C30 C31 C33 C34: library part CC1206KKX7RBBB223, "CAP CER 0.022UF 500V X7R 1206", LCSC Part Number=C326702, Manufacturer=Yageo, ComponentLink1Description=http://www.mouser.com/ds/2/447/Yageo_UPY-GP_NP0_16V-to-50V_9-358835.pdf?src-supplier=Mouser, ComponentLink1URL=http://www.mouser.com/ds/2/447/Yageo_UPY-GP_NP0_16V-to-50V_9-358835.pdf?src-supplier=Mouser, ComponentLink2Description=http://www.yageo.com/documents/recent/UPY-NP0X7R_MV_100-to-630V_9.pdf?src-supplier=Avnet, ComponentLink2URL=http://www.yageo.com/documents/recent/UPY-NP0X7R_MV_100-to-630V_9.pdf?src-supplier=Avnet, ComponentLink3Description=http://www.yageo.com/documents/recent/UPY-NP0X7R_MV_100-to-630V_19.pdf?src-supplier=Digikey, ComponentLink3URL=http://www.yageo.com/documents/recent/UPY-NP0X7R_MV_100-to-630V_19.pdf?src-supplier=Digikey, ComponentLink4Description=http://www.yageo.com/documents/recent/UPY-NP0X7R_MV_100-to-630V_21.pdf?src-supplier=Digikey, ComponentLink4URL=http://www.yageo.com/documents/recent/UPY-NP0X7R_MV_100-to-630V_21.pdf?src-supplier=Digikey, ComponentLink5Description=https://www.yageo.com/upload/media/product/products/datasheet/mlcc/UPY-NP0X7R_MV_100-to-630V_21.pdf?src-supplier=Digikey, ComponentLink5URL=https://www.yageo.com/upload/media/product/products/datasheet/mlcc/UPY-NP0X7R_MV_100-to-630V_21.pdf?src-supplier=Digikey, ComponentLink6Description=http://www.yageo.com/documents/recent/UPY-NP0X7R_MV_100-to-630V_9.pdf?src-supplier=Future+Electronics, ComponentLink6URL=http://www.yageo.com/documents/recent/UPY-NP0X7R_MV_100-to-630V_9.pdf?src-supplier=Future+Electronics, ComponentLink7Description=https://datasheet.octopart.com/CC1206KKX7RBBB223-Yageo-datasheet-10979222.pdf?src-supplier=Future+Electronics, ComponentLink7URL=https://datasheet.octopart.com/CC1206KKX7RBBB223-Yageo-datasheet-10979222.pdf?src-supplier=Future+Electronics, Item Type=Capacitors, Lead Free=5697LeadFree, Manufacturer Part Number=CC1206KKX7RBBB223, Pricing="3000=0.0421, 6000=0.0414, 12000=0.0407, 15000=0.0405, 45000=0.0392 (USD)", RoHS=Yes, Stock=660000, Supplier="Future Electronics"